# Altium PCB PCB1.PcbDoc
Units mm, origin at the board's own origin, x right, y up, seen from the top; angles counter-clockwise.
Board outline 97 x 82 mm, 4 copper layers (Top Layer, Layer (GND), Layer (PWR), Bottom Layer), stack 0.603 mm thick; 99 components, 112 nets, 370 pads, 75 vias.
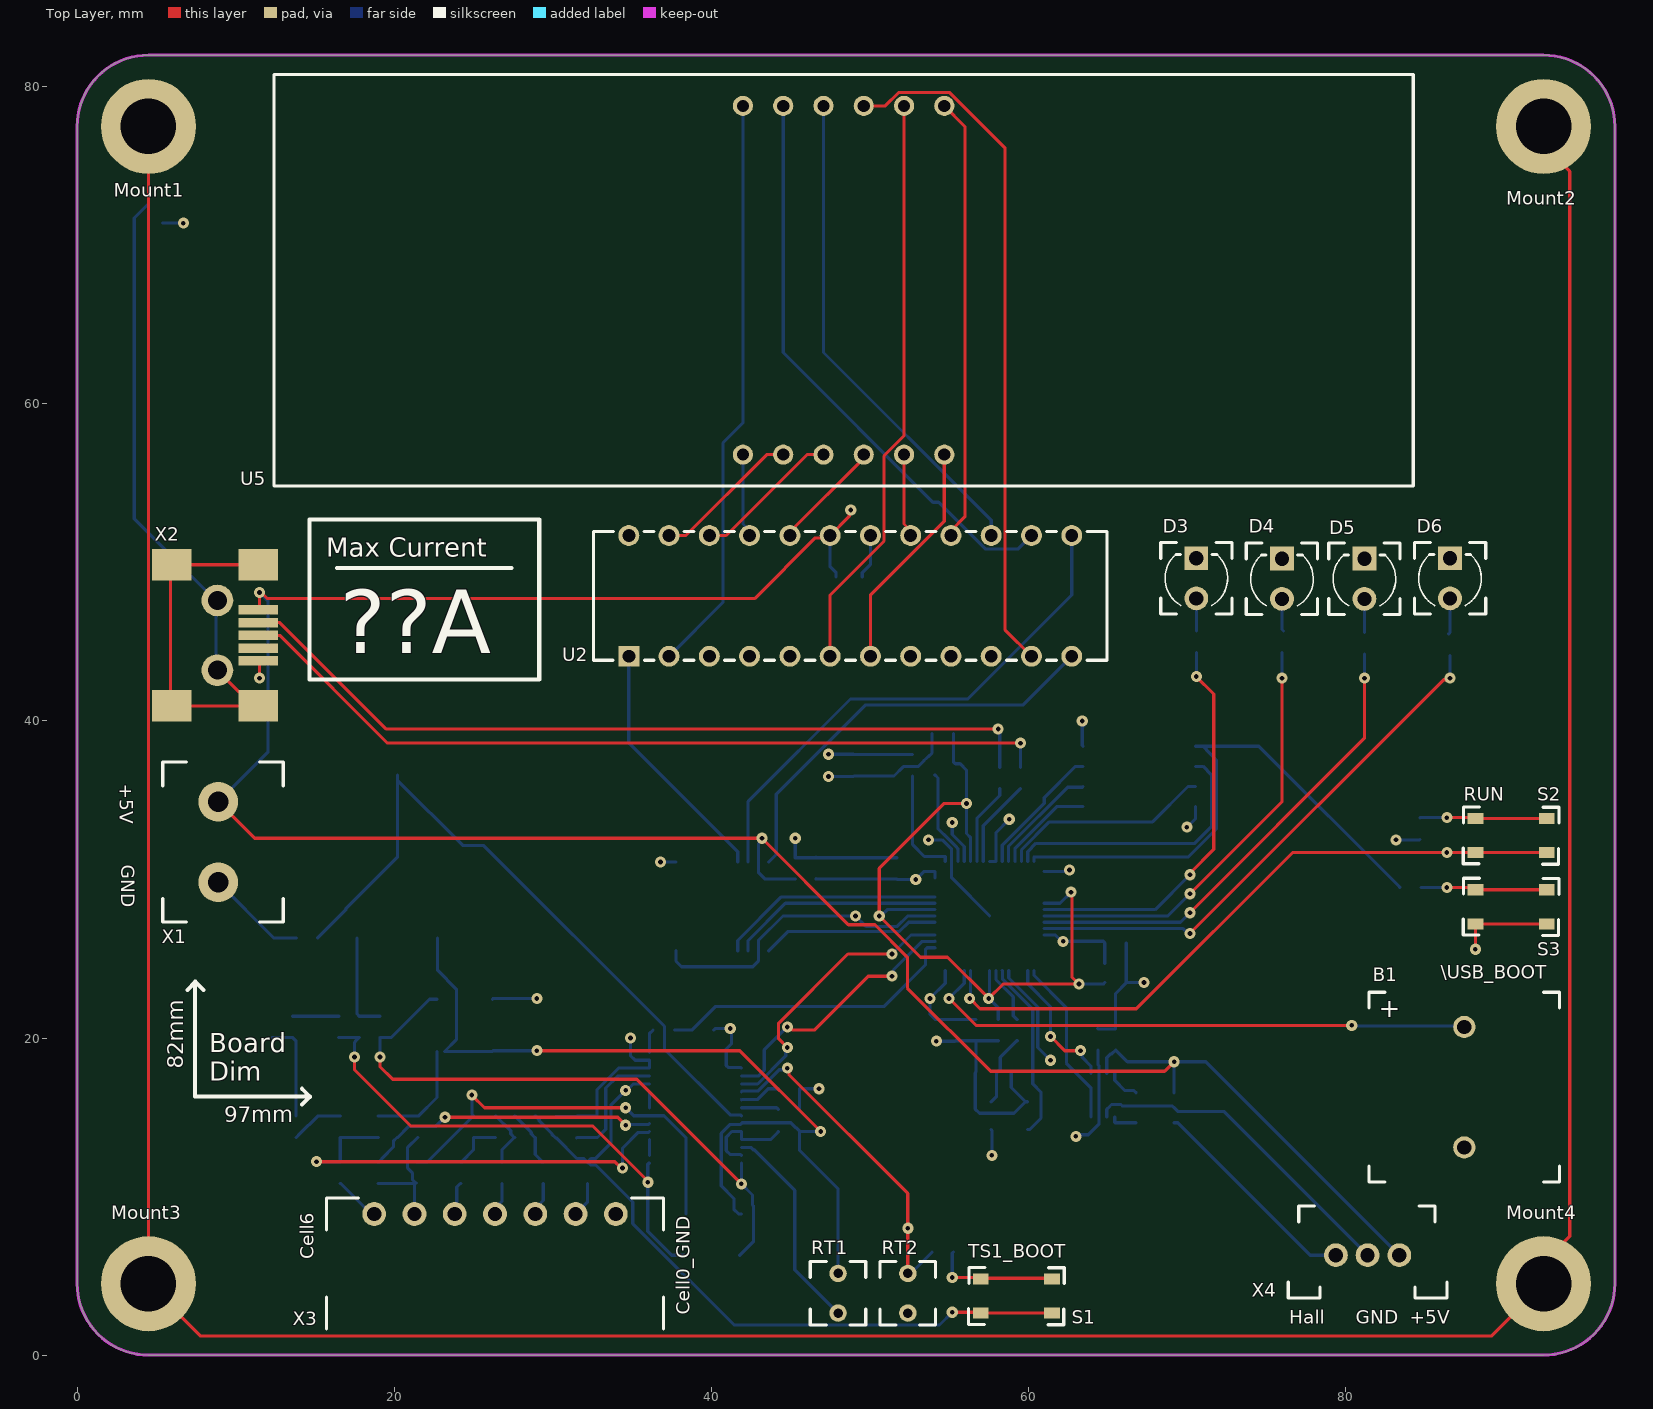
[diagram p0: Top Layer view]
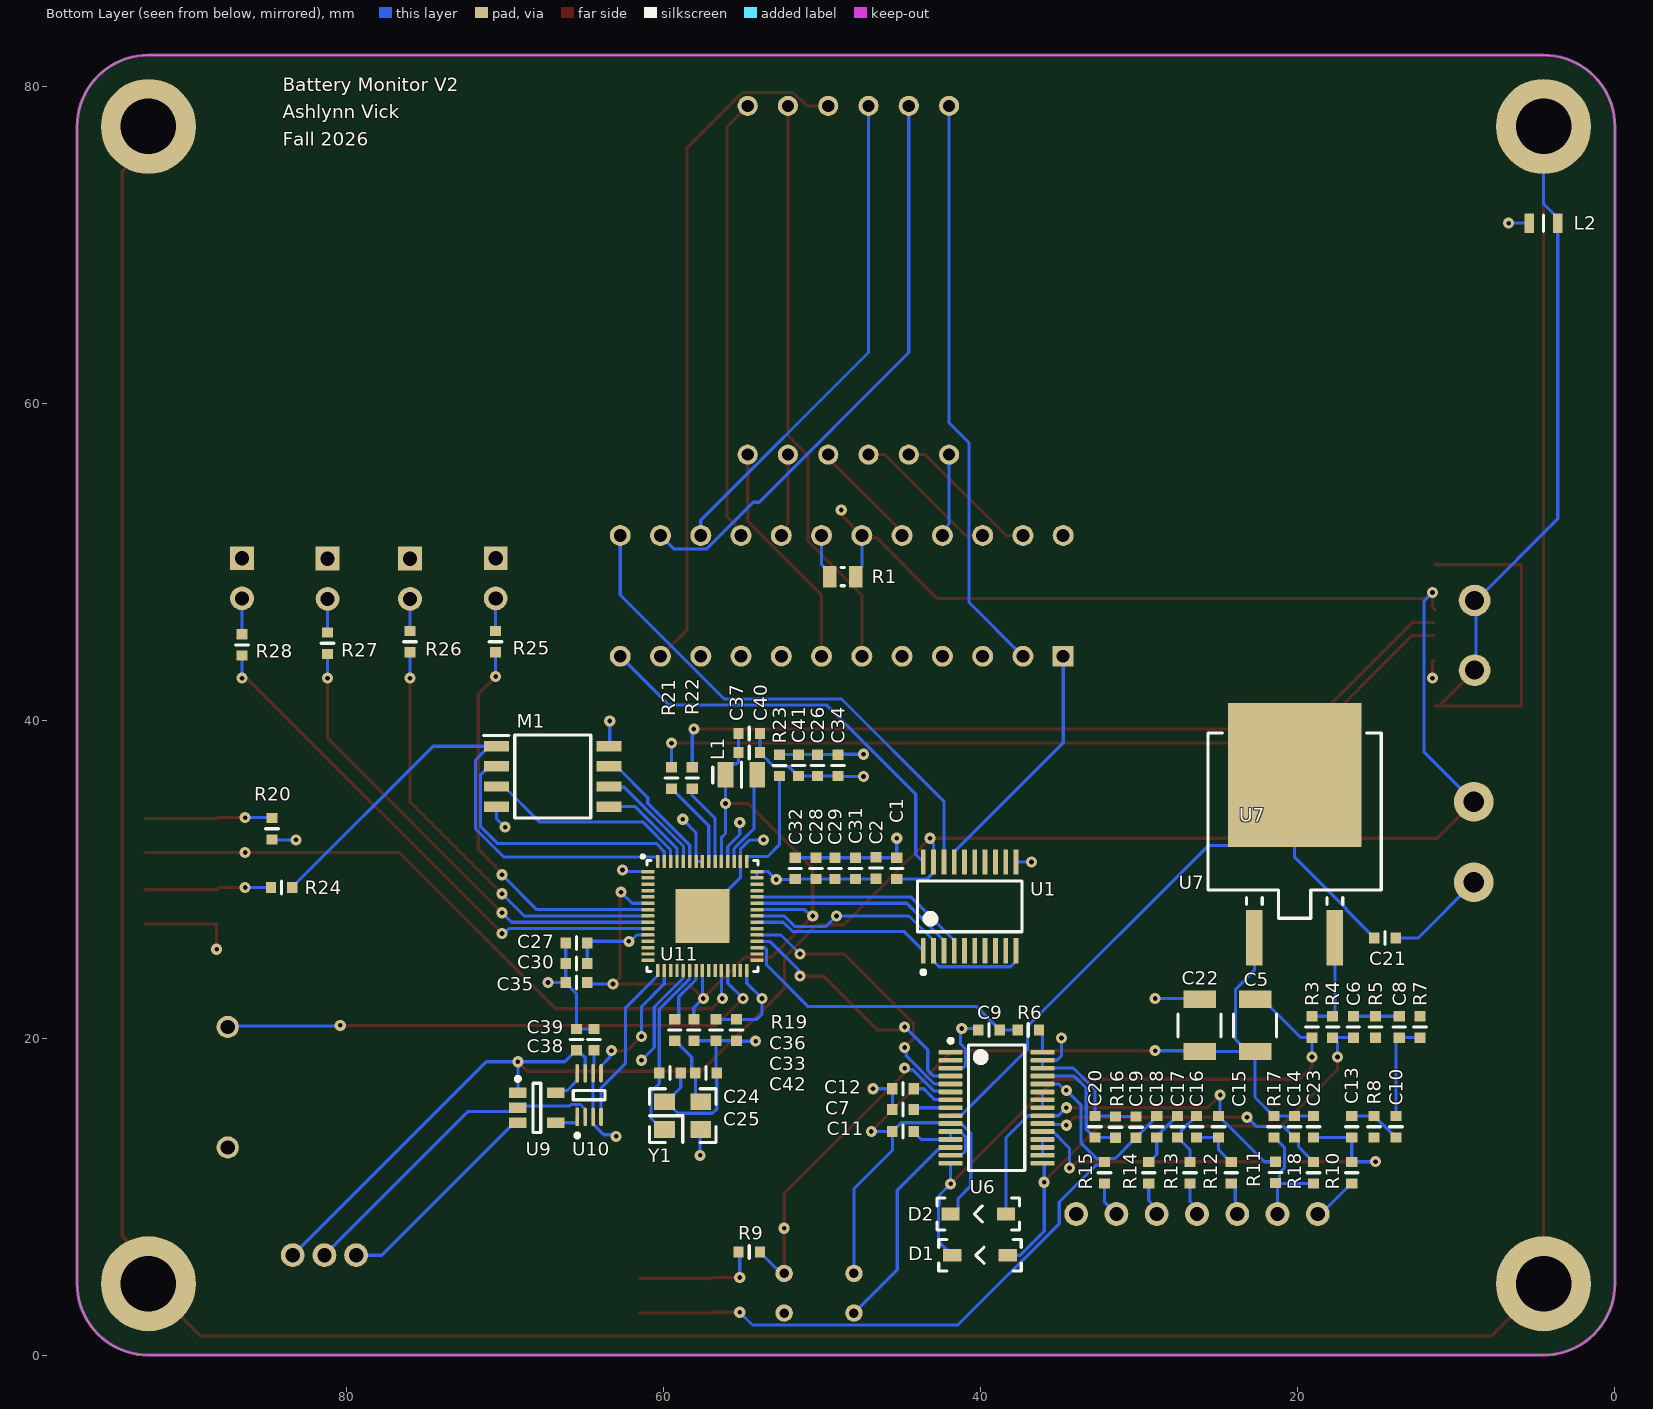
[diagram p1: Bottom Layer view, seen from below]
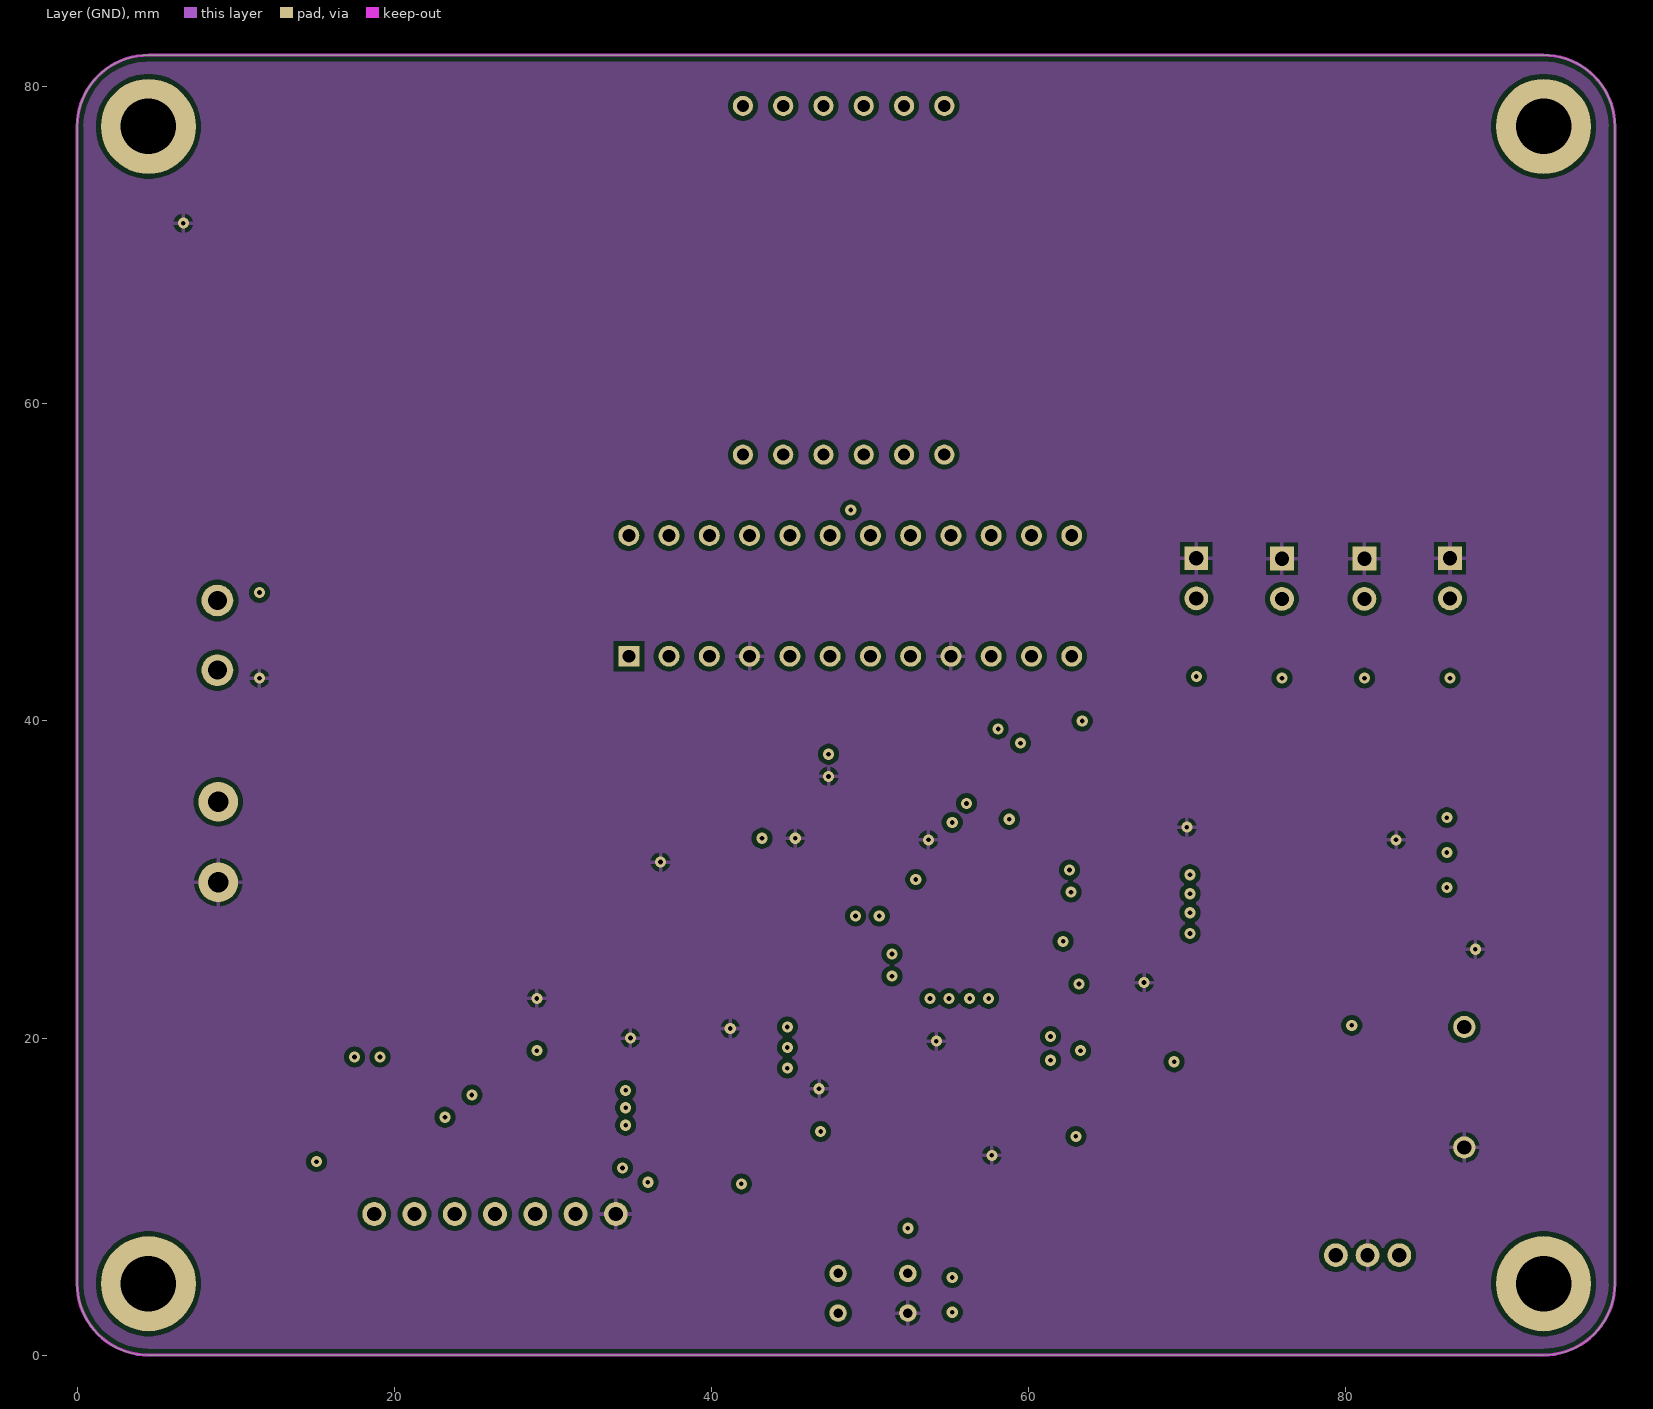
[diagram p2: Layer (GND)]
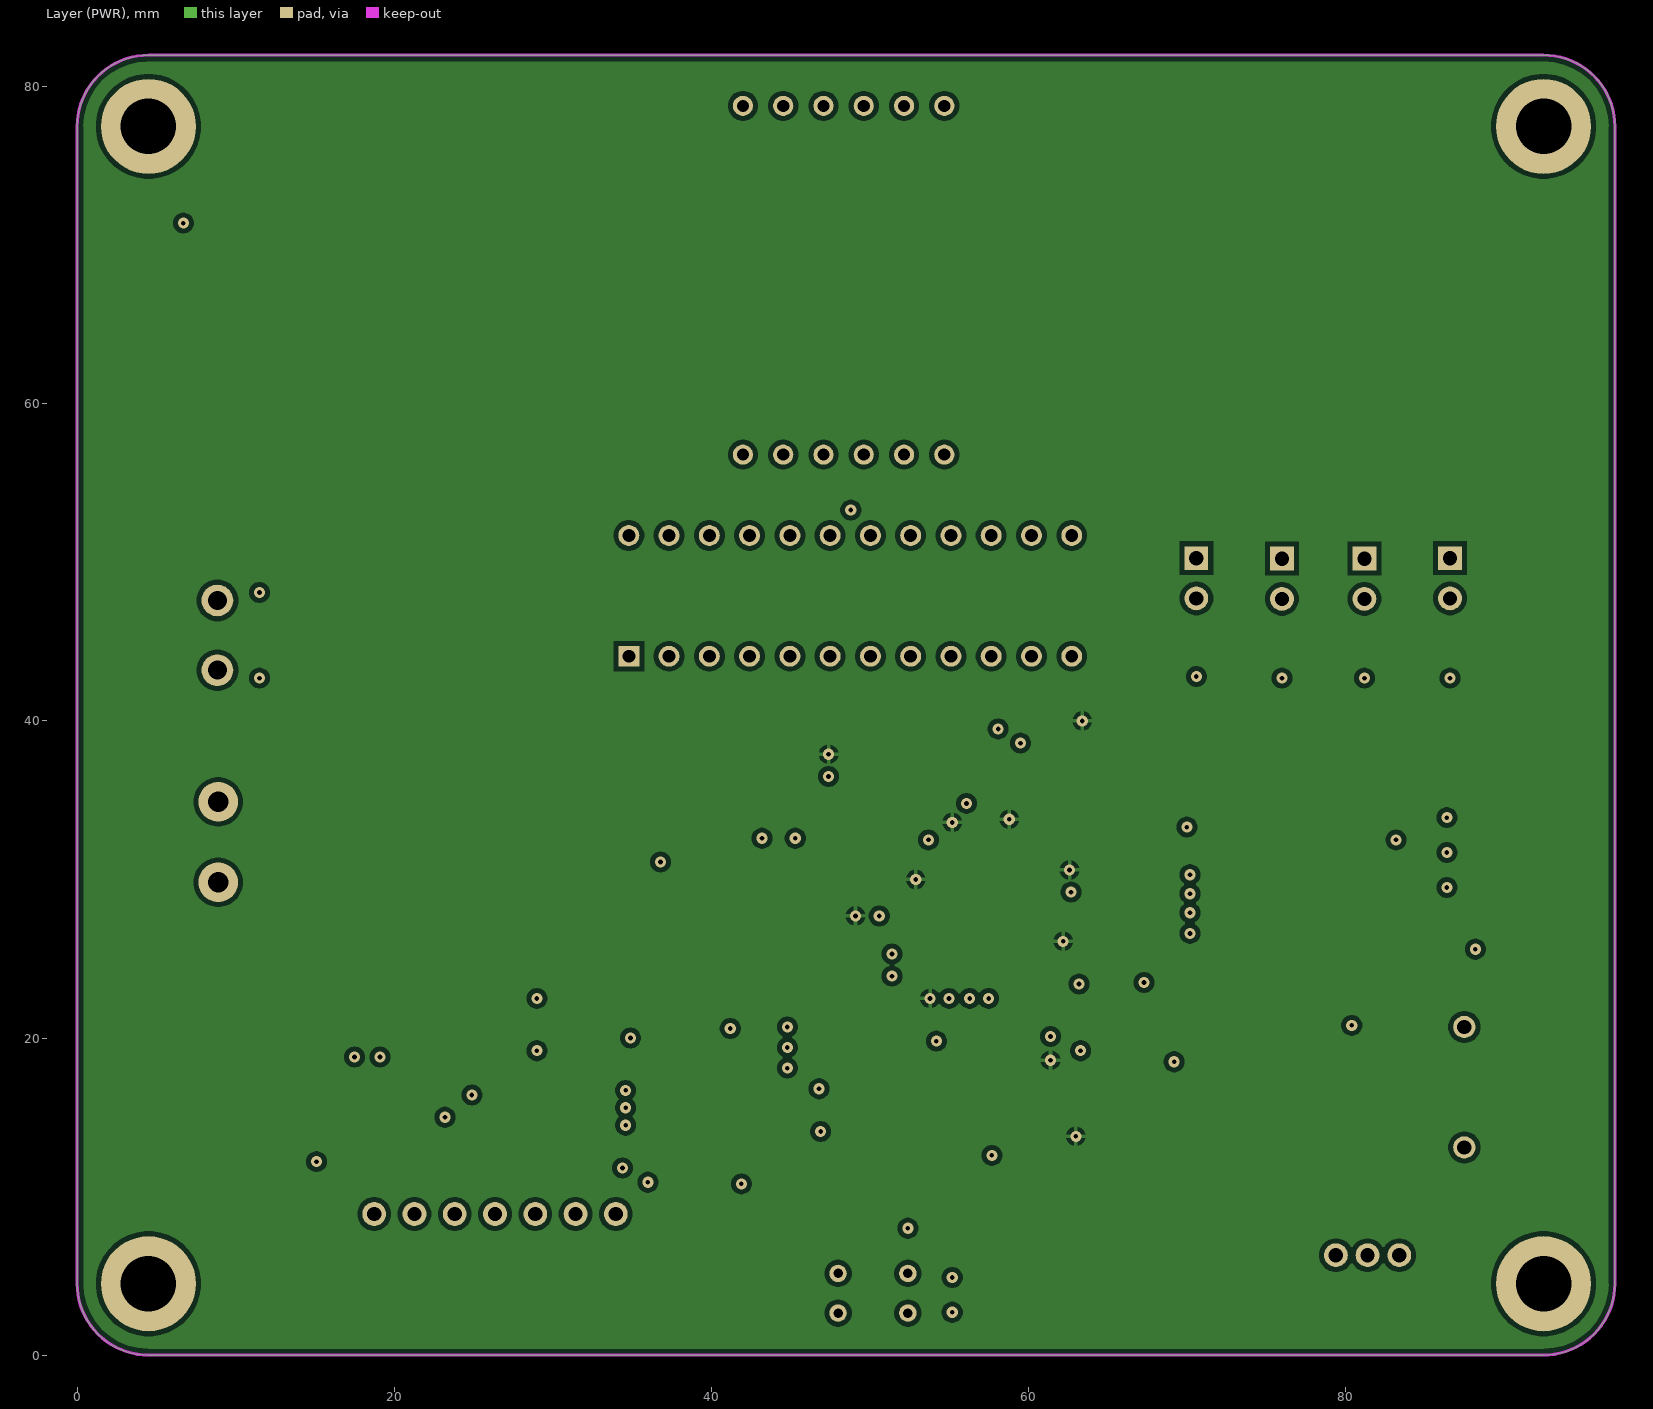
[diagram p3: Layer (PWR)]

## Layer stack, top to bottom
Top Solder: solder mask 0.0102, Solder Resist, Dk 3.5
Top Layer: signal copper 0.0356
Dielectric 2: prepreg 0.0711, PP-006, Dk 4.1
Layer (GND): signal copper 0.035
Dielectric 1: dielectric 0.32, FR-4, Dk 4.8
Layer (PWR): signal copper 0.035
Dielectric 3: prepreg 0.0711, PP-006, Dk 4.1
Bottom Layer: signal copper 0.0356
Bottom Solder: solder mask 0.0102, Solder Resist, Dk 3.5

## Board outline
0,4.5 0,77.5 cw(c4.5,77.5) 4.5,82 92.5,82 cw(c92.5,77.5) 97,77.5 97,4.5 cw(c92.5,4.5) 92.5,0 4.5,0 cw(c4.5,4.5)

## Design rules (kind name [scope] priority, off if disabled: settings)
BoardOutlineClearance [All] p1: gap=0.2 ignorepadtopadclearanceinfootprint=FALSE
Clearance "inPolygon Clearance" [InPolygon] p1: gap=0.3 ignorepadtopadclearanceinfootprint=TRUE // this rule ensures that every net within a polygon of a different net has a set clearance from the poly
Clearance "Different Diff Pair" [All] p2: gap=0.2 ignorepadtopadclearanceinfootprint=TRUE
Clearance "Same Diff Pair" [All] p3: gap=0.1 ignorepadtopadclearanceinfootprint=TRUE
Clearance "Different Nets" [not InAnyDifferentialPair] p4: gap=0.3 ignorepadtopadclearanceinfootprint=TRUE except(0.1: Arc-SMDPad Arc-THPad Arc-Via Arc-Text Track-SMDPad Track-THPad Track-Via Track-Text SMDPad-Text THPad-Text Via-Text Fill-Text Poly-Text Region-Text Text-Text; 0.12: Arc-Arc Arc-Track Track-Track; 0.15: SMDPad-SMDPad SMDPad-THPad SMDPad-Via THPad-THPad THPad-Via Via-Via; 0.2: Arc-Hole Track-Hole SMDPad-Hole THPad-Hole Via-Hole Fill-Hole Poly-Hole Region-Hole Text-Hole)
Clearance "Same Net" [not InAnyDifferentialPair] p5: gap=0 ignorepadtopadclearanceinfootprint=TRUE except(0.1: THPad-Via; 0.18: Arc-Arc Arc-Track Track-Track)
ComponentClearance [All] p1: gap=0.102 collisioncheckmode=3 verticalgap=0.102 showdistances=TRUE
DiffPairsRouting "Ethernet Routing" [InDifferentialPairClass('Ethernet_Pairs')] p1: maxlimit=0.25 minlimit=0.2 mostfreqgap=0.25 toplayer_maxgap=0.2 toplayer_prefgap=0.2 toplayer_minwidth=0.25 toplayer_maxwidth=0.25 toplayer_prefwidth=0.25 midlayer1_mingap=0.25 midlayer1_minwidth=0.19 midlayer1_maxwidth=0.19 midlayer1_prefwidth=0.19 midlayer2_mingap=0.25 midlayer2_minwidth=0.19 midlayer2_maxwidth=0.19 midlayer2_prefwidth=0.19 bottomlayer_maxgap=0.2 bottomlayer_prefgap=0.2 bottomlayer_minwidth=0.25 bottomlayer_maxwidth=0.25 bottomlayer_prefwidth=0.25 impedanceprofiledriven=TRUE maxuncoupledlength=12.7
DiffPairsRouting "USB Routing" [InDifferentialPairClass('USB_Pairs')] p2: maxlimit=0.291 minlimit=0.127 mostfreqgap=0.291 toplayer_maxgap=0.127 toplayer_prefgap=0.127 toplayer_minwidth=0.23 toplayer_maxwidth=0.23 toplayer_prefwidth=0.23 midlayer1_mingap=0.291 midlayer1_minwidth=0.25 midlayer1_maxwidth=0.25 midlayer1_prefwidth=0.25 midlayer2_mingap=0.291 midlayer2_minwidth=0.25 midlayer2_maxwidth=0.25 midlayer2_prefwidth=0.25 bottomlayer_maxgap=0.127 bottomlayer_prefgap=0.127 bottomlayer_minwidth=0.23 bottomlayer_maxwidth=0.23 bottomlayer_prefwidth=0.23 maxuncoupledlength=12.7
DiffPairsRouting "CAN Routing" [InDifferentialPairClass('CAN_Pairs')] p3: maxlimit=0.907 minlimit=0.5 mostfreqgap=0.907 toplayer_maxgap=0.5 toplayer_prefgap=0.5 toplayer_minwidth=0.201 toplayer_maxwidth=0.201 toplayer_prefwidth=0.201 midlayer1_mingap=0.907 midlayer1_minwidth=0.155 midlayer1_maxwidth=0.155 midlayer1_prefwidth=0.155 midlayer2_mingap=0.907 midlayer2_minwidth=0.155 midlayer2_maxwidth=0.155 midlayer2_prefwidth=0.155 bottomlayer_maxgap=0.5 bottomlayer_prefgap=0.5 bottomlayer_minwidth=0.201 bottomlayer_maxwidth=0.201 bottomlayer_prefwidth=0.201 impedanceprofiledriven=TRUE maxuncoupledlength=12.7
Height [All] p1: minheight=0 maxheight=1816.048 prefheight=12.7
HoleSize [All] p1: absolutevalues=TRUE maxlimit=6.3 minlimit=0.3 maxpercent=80.000 minpercent=20.000
HoleToHoleClearance [All] p1: gap=0.25 allowstackedmicrovias=FALSE
MatchedLengths "XTAL Nets Matched Delays" [InNetClass('XTAL_Nets')] p1: tolerance=25.4 checknetsindiffpair=FALSE checkdiffpairvsdiffpair=TRUE checkxsignals=TRUE checkothers=TRUE usedelayunits=TRUE delaytolerance=10.000000
MatchedLengths "Diff Pair Matched Delays" [InDifferentialPairClass('Ethernet_Pairs') or InDifferentialPairClass('USB_Pairs') or InDifferentialPairClass('CAN_Pairs')] p2: tolerance=5 checknetsindiffpair=TRUE checkdiffpairvsdiffpair=FALSE checkxsignals=FALSE checkothers=FALSE usedelayunits=TRUE delaytolerance=100.000000 phasematching=TRUE phasedelaytolerance=5.000000 phasedistance=12.7
MinimumAnnularRing [All] p1: minimumring=0.2
MinimumSolderMaskSliver [All] p1: minsoldermaskwidth=0
PlaneClearance "Supply Net Clearance" [InNetClass('Supply_Nets')] p1: clearance=0.5
PlaneClearance "All Nets" [All] p2: clearance=0.3
PolygonConnect "Supply Nets" [InNetClass('Supply_Nets')] p1: connectstyle=Relief reliefconductorwidth=0.3 reliefentries=4 polygonreliefangle="90 Angle" conductorbypadedge=TRUE mindistance=0.381 enablemindistance=FALSE airgapwidth=0.254
PolygonConnect General [All] p2: connectstyle=Relief reliefconductorwidth=0.254 reliefentries=4 polygonreliefangle="90 Angle" airgapwidth=0.254
RoutingVias [All] p1: holewidth=0.2 width=0.35 viastyle="Through Hole" minholewidth=0.15 minwidth=0.3 maxholewidth=6.3 maxwidth=6.55
SilkToSilkClearance [All] p1: silktosilkclearance=0
SilkToSolderMaskClearance [All] p1: minsilkscreentomaskgap=0 clearancetoexposedcopper=TRUE
SolderMaskExpansion [All] p1: expansion=0.075 istentingtop=FALSE
SupplyNets "Schematic Supply Nets_14" [InNet('D_LOAD (C\S\\) 3V3')] p1: voltage=0.000
SupplyNets "Schematic Supply Nets_13" [InNet('BAT')] p2: voltage=0.000
SupplyNets "Schematic Supply Nets_12" [InNet('MOSI1 3V3')] p3: voltage=0.000
SupplyNets "Schematic Supply Nets_11" [InNet('SCK1 3V3')] p4: voltage=0.000
SupplyNets "Schematic Supply Nets_10" [InNet('SCK1 5V')] p5: voltage=0.000
SupplyNets "Schematic Supply Nets_9" [InNet('MOSI1 5V')] p6: voltage=0.000
SupplyNets "Schematic Supply Nets_8" [InNet('D_LOAD (C\S\\) 5V')] p7: voltage=0.000
SupplyNets "Schematic Supply Nets_7" [InNet('+1V1')] p8: voltage=0.000
SupplyNets "Schematic Supply Nets_6" [InNet('+3V3')] p9: voltage=0.000
SupplyNets "Schematic Supply Nets_5" [InNet('XOUT')] p10: voltage=0.000
SupplyNets "Schematic Supply Nets_4" [InNet('+5V')] p11: voltage=0.000
SupplyNets "Schematic Supply Nets_2" [InNet('XIN')] p12: voltage=0.000
SupplyNets "Schematic Supply Nets" [InNet('RUN')] p13: voltage=0.000
SupplyNets "Schematic Supply Nets_3" [InNet('GND')] p14: voltage=0.000
SupplyNets "Schematic Supply Nets_1" [InNet('Earth')] p15: voltage=0.000
UnRoutedNet [All] p1: checkbadconnections=TRUE
Width "nRF Width" [InNetClass('nRF Signal')] p1: maxlimit=0.379 minlimit=0.263 preferedwidth=0.379 toplayer_minwidth=0.379 midlayer1_maxwidth=0.263 midlayer1_prefwidth=0.263 midlayer2_maxwidth=0.263 midlayer2_prefwidth=0.263 bottomlayer_minwidth=0.379 impedanceprofiledriven=TRUE minimp=50.000000 maximp=50.000000 favimp=50.000000 checkconnectedcopper=TRUE
Width [All] p2: maxlimit=100 minlimit=0.1 preferedwidth=0.2
20 further rules are at their usual default settings.

## Classes and differential pairs
component class Seven-Seg: B1 C1 C2 D3 D4 D5 D6 L2 Mount1 Mount2 Mount3 Mount4 R1 R25 R26 R27 R28 U1 U2 U5
component class RP2350A: C24 C25 C26 C27 C28 C29 C30 C31 C32 C33 C34 C35 C36 C37 C40 C41 C42 L1 M1 R19 R20 R21 R22 R23 R24 S2 S3 U11 X2 Y1
component class Battery-Voltage: C5 C6 C7 C8 C9 C10 C11 C12 C13 C14 C15 C16 C17 C18 C19 C20 C21 C22 C23 D1 D2 R3 R4 R5 R6 R7 R8 R9 R10 R11 R12 R13 R14 R15 R16 R17 R18 RT1 RT2 S1 U6 U7 X1 X3
component class Battery-Current: C38 C39 U9 U10 X4
differential pair RP2350_DX: +RP2350_DX_P -RP2350_DX_N
differential pair RP2350_D: +RP2350_D_P -RP2350_D_N

## Components (designator, comment, footprint, x,y, rotation, side; value= is the part's Value field where it differs from the comment)
B1 "Passive Buzzer" "[Buzzer] Passive Thru-Hole 3V 30mA" 87.5,16.9 r0 top
C1 "[Cap] 0603 0.1uF 10% 50V" "[Cap] SMD 0603" 45.3,30.7 r90 bottom
C2 "[Cap] 0603 0.1uF 10% 50V" "[Cap] SMD 0603" 46.6,30.725 r90 bottom
C5 "10uF ±20% 50VDC" FP-GCM32E-0_3-MFG 22.7,20.8 r90 bottom
C6 "[Cap] 0603 1uF 10% 25V" "[Cap] SMD 0603" 16.5,20.7 r270 bottom
C7 "[Cap] 0603 4.7uF 10% 25V" "[Cap] SMD 0603" 44.9,15.5 r180 bottom
C8 "[Cap] 0603 1uF 10% 25V" "[Cap] SMD 0603" 13.6,20.7 r90 bottom
C9 "[Cap] 0603 470pF 5% 50V" "[Cap] SMD 0603" 39.475,20.5 r180 bottom
C10 "[Cap] 0603 1uF 10% 25V" "[Cap] SMD 0603" 13.8,14.4 r90 bottom
C11 "[Cap] 0603 1uF 10% 25V" "[Cap] SMD 0603" 44.9,14.1 r180 bottom
C12 "[Cap] 0603 1uF 10% 25V" "[Cap] SMD 0603" 44.9,16.8 r180 bottom
C13 "[Cap] 0603 1uF 10% 25V" "[Cap] SMD 0603" 16.6,14.4 r90 bottom
C14 "[Cap] 0603 1uF 10% 25V" "[Cap] SMD 0603" 20.2,14.4 r90 bottom
C15 "[Cap] 0603 1uF 10% 25V" "[Cap] SMD 0603" 25,14.4 r90 bottom
C16 "[Cap] 0603 1uF 10% 25V" "[Cap] SMD 0603" 26.4,14.4 r270 bottom
C17 "[Cap] 0603 1uF 10% 25V" "[Cap] SMD 0603" 27.6,14.4 r270 bottom
C18 "[Cap] 0603 1uF 10% 25V" "[Cap] SMD 0603" 28.9,14.4 r270 bottom
C19 "[Cap] 0603 1uF 10% 25V" "[Cap] SMD 0603" 30.2,14.375 r270 bottom
C20 "[Cap] 0603 1uF 10% 25V" "[Cap] SMD 0603" 32.8,14.4 r90 bottom
C21 "[Cap] 0603 1uF 10% 25V" "[Cap] SMD 0603" 14.5,26.3 r0 bottom
C22 "10uF ±20% 50VDC" FP-GCM32E-0_3-MFG 26.2,20.8 r270 bottom
C23 "[Cap] 0603 1uF 10% 25V" "[Cap] SMD 0603" 19,14.4 r270 bottom
C24 "[Cap] 0603 15pF 1% 100V" "[Cap] SMD 0603" 59.6,17.8 r0 bottom
C25 "[Cap] 0603 15pF 1% 100V" "[Cap] SMD 0603" 57.325,17.8 r0 bottom
C26 "[Cap] 0603 0.1uF 10% 50V" "[Cap] SMD 0603" 50.3,37.2 r90 bottom
C27 "[Cap] 0603 0.1uF 10% 50V" "[Cap] SMD 0603" 65.5,26 r180 bottom
C28 "[Cap] 0603 0.1uF 10% 50V" "[Cap] SMD 0603" 50.4,30.7 r270 bottom
C29 "[Cap] 0603 0.1uF 10% 50V" "[Cap] SMD 0603" 49.2,30.7 r270 bottom
C30 "[Cap] 0603 0.1uF 10% 50V" "[Cap] SMD 0603" 65.5,24.7 r180 bottom
C31 "[Cap] 0603 0.1uF 10% 50V" "[Cap] SMD 0603" 47.9,30.7 r270 bottom
C32 "[Cap] 0603 0.1uF 10% 50V" "[Cap] SMD 0603" 51.7,30.7 r270 bottom
C33 "[Cap] 0603 0.1uF 10% 50V" "[Cap] SMD 0603" 56.7,20.5 r90 bottom
C34 "[Cap] 0603 4.7uF 10% 25V" "[Cap] SMD 0603" 49,37.2 r270 bottom
C35 "[Cap] 0603 0.1uF 10% 50V" "[Cap] SMD 0603" 65.5,23.5 r180 bottom
C36 "[Cap] 0603 0.1uF 10% 50V" "[Cap] SMD 0603" 58.1,20.5 r90 bottom
C37 "[Cap] 0603 4.7uF 10% 25V" "[Cap] SMD 0603" 54.6,39.2 r0 bottom
C38 "[Cap] 0603 0.1uF 10% 50V" "[Cap] SMD 0603" 64.4,19.9 r270 bottom
C39 "[Cap] 0603 0.1uF 10% 50V" "[Cap] SMD 0603" 65.5,19.9 r90 bottom
C40 "[Cap] 0603 4.7uF 10% 25V" "[Cap] SMD 0603" 54.6,38 r180 bottom
C41 "[Cap] 0603 4.7uF 10% 25V" "[Cap] SMD 0603" 51.5,37.2 r90 bottom
C42 "[Cap] 0603 0.1uF 10% 50V" "[Cap] SMD 0603" 55.4,20.5 r90 bottom
D1 "SOD123" "[Diode] SMD SOD-123" 40.05,6.3 r0 bottom
D2 "SOD123" "[Diode] SMD SOD-123" 40.15,8.9 r0 bottom
D3 "[LED] Thru-Hole 3mm Red" "[LED] Thru-Hole 3mm Red" 70.6,49 r90 top
D4 "[LED] Thru-Hole 3mm Yellow" "[LED] Thru-Hole 3mm Yellow" 76,48.97 r90 top
D5 "[LED] Thru-Hole 3mm Green" "[LED] Thru-Hole 3mm Green" 81.2,48.97 r90 top
D6 "[LED] Thru-Hole 3mm White" "[LED] Thru-Hole 3mm White" 86.6,49 r90 top
L1 "[3.3uH] SMD 0806 2.1A" "[Inductor] SMD 0806" 55.1,36.6 r180 bottom
L2 "652-MH2029-300Y" "[Ferrite] SMD 0805" 4.5,71.4 r180 bottom
M1 "W25Q128JVSIM" "[Flash] 128MBit" 67,36.5 r180 bottom
Mount1 "M3 Mount Hole" "[Mount] M3 Mount Hole" 4.5,77.5 r0 top
Mount2 "M3 Mount Hole" "[Mount] M3 Mount Hole" 92.5,77.5 r0 top
Mount3 "M3 Mount Hole" "[Mount] M3 Mount Hole" 4.5,4.5 r0 top
Mount4 "M3 Mount Hole" "[Mount] M3 Mount Hole" 92.5,4.5 r0 top
R1 "9.53 kOhms ±1% 0.25W, 1/4W" RESC2013X60X30LL20T20 48.7,49.1 r0 bottom
R3 "[100] SMD 0603 1% 1/10W" "[Res] SMD 0603" 19.1,20.7 r90 bottom
R4 "[1k] SMD 0603 1% 1/10W" "[Res] SMD 0603" 17.8,20.7 r270 bottom
R5 "[1k] SMD 0603 1% 1/10W" "[Res] SMD 0603" 15.1,20.7 r90 bottom
R6 "[499k] SMD 0603 1% 1/8W" "[Res] SMD 0603" 37,20.5 r0 bottom
R7 "[1k] SMD 0603 1% 1/10W" "[Res] SMD 0603" 12.3,20.7 r270 bottom
R8 "[1k] SMD 0603 1% 1/10W" "[Res] SMD 0603" 15.2,14.4 r90 bottom
R9 "[10k] SMD 0603 1% 1/8W" "[Res] SMD 0603" 54.6,6.5 r0 bottom
R10 "[1k] SMD 0603 1% 1/10W" "[Res] SMD 0603" 16.6,11.5 r90 bottom
R11 "[1k] SMD 0603 1% 1/10W" "[Res] SMD 0603" 21.4,11.525 r90 bottom
R12 "[1k] SMD 0603 1% 1/10W" "[Res] SMD 0603" 24.2,11.5 r90 bottom
R13 "[1k] SMD 0603 1% 1/10W" "[Res] SMD 0603" 26.8,11.5 r90 bottom
R14 "[1k] SMD 0603 1% 1/10W" "[Res] SMD 0603" 29.4,11.5 r90 bottom
R15 "[1k] SMD 0603 1% 1/10W" "[Res] SMD 0603" 32.2,11.5 r90 bottom
R16 "[1k] SMD 0603 1% 1/10W" "[Res] SMD 0603" 31.5,14.375 r270 bottom
R17 "[100] SMD 0603 1% 1/10W" "[Res] SMD 0603" 21.5,14.4 r90 bottom
R18 "[1k] SMD 0603 1% 1/10W" "[Res] SMD 0603" 19,11.5 r90 bottom
R19 "[1k] SMD 0603 1% 1/10W" "[Res] SMD 0603" 59.3,20.5 r90 bottom
R20 "[1k] SMD 0603 1% 1/10W" "[Res] SMD 0603" 84.7,33.2 r90 bottom
R21 "[27] SMD 0603 1% 1/10W" "[Res] SMD 0603" 59.5,36.4 r270 bottom
R22 "[27] SMD 0603 1% 1/10W" "[Res] SMD 0603" 58.2,36.4 r270 bottom
R23 "[33] SMD 0603 0.5% 1/16W" "[Res] SMD 0603" 52.7,37.2 r270 bottom
R24 "[1k] SMD 0603 1% 1/10W" "[Res] SMD 0603" 84.1,29.5 r0 bottom
R25 "[220] SMD 0603 5% 1/10W" "[Res] SMD 0603" 70.6,45 r90 bottom
R26 "[220] SMD 0603 5% 1/10W" "[Res] SMD 0603" 76,45 r90 bottom
R27 "[220] SMD 0603 5% 1/10W" "[Res] SMD 0603" 81.2,44.9 r90 bottom
R28 "[220] SMD 0603 5% 1/10W" "[Res] SMD 0603" 86.6,44.8 r90 bottom
RT1 "[NTC] 10k Thru-Hole" "[NTC] 10k Thru-Hole" 48,3.9 r90 top
RT2 "[NTC] 10k Thru-Hole" "[NTC] 10k Thru-Hole" 52.4,3.9 r90 top
S1 "[SPST] SMD Pushbutton" "[SPST] SMD Pushbutton" 59.25,3.725 r0 top
S2 "[SPST] SMD Pushbutton" "[SPST] SMD Pushbutton" 90.45,32.775 r0 top
S3 "[SPST] SMD Pushbutton" "[SPST] SMD Pushbutton" 90.45,28.275 r0 top
U1 "TXS0108EQPWRQ1" FP-PW0020A-MFG 40.7,28.3 r90 bottom
U2 "MAX7219CNG" 21-0043D_24_MXM 34.8,44.08 r90 top
U5 "COM-11405" COM-11405_SPK 42,56.8 r90 top
U6 "BQ7693003DBTR" FP-DBT0030A-MFG 39,15.6 r180 bottom
U7 "AOB290L" TO-263-3_AOS 20.2,34.289 r180 bottom
U9 "MCP3221A0T-E/OT" SOT-23-OT5_N 68,15.6 r180 bottom
U10 "TCA9406DCUR" FP-DCU0008A-IPC_B 64.7,16.4 r90 bottom
U11 "RP2350A" "[MCU] RP2350A" 57.56,27.7 r180 bottom
X1 "2pin Screw Terminal" "[Screw Terminal] 2pin 5mm" 8.9,32.4 r270 top
X2 "[USB] Type-B Mini" "[USB] Type-B Mini" 7.6,45.4 r270 top
X3 "[JST] 7pin 90deg 2.54mm pitch" "[JST] 7pin 90deg 2.54mm pitch" 26.36,8.9 r270 top
X4 "[Sherlock] 3pin" "[Sherlock] 3pin" 81.4,6.3 r180 top
Y1 "XTAL 12MHz" "[Crystal] SMD 12MHz" 58.8,15.1 r180 bottom

## Footprints (in the part's own frame and the unit in brackets; to place one, negate y for a bottom-side part, rotate by r counter-clockwise, add the part's x,y. Pads: shape width x height; smd on the part's side, far side on the other; paste and mask are expansions set on the pad)
21-0043D_24_MXM [mil]
  rect 52x52 hole 32 paste-99999 mask+0: 1(0,0)
  round 52 hole 32 paste-99999 mask+0: 2(0,-100) 3(0,-200) 4(0,-300) 5(0,-400) 6(0,-500) 7(0,-600) 8(0,-700) 9(0,-800) 10(0,-900) 11(0,-1000) 12(0,-1100) 13(300,-1100) 14(300,-1000) 15(300,-900) 16(300,-800) 17(300,-700) 18(300,-600) 19(300,-500) 20(300,-400) 21(300,-300) 22(300,-200) 23(300,-100) 24(300,0)
  silkscreen extent -10,-1188 310,88, body extent -5,-1183 310,83, height 185
"[Buzzer] Passive Thru-Hole 3V 30mA" [mm] "AI-1223-TWT-3V-2-R"
  round 1.4 hole 0.9: 1(0,3.8) 2(0,-3.8)
  silkscreen extent -6,-5.99 6,5.99, body extent -6,-5.99 6,5.99, height 7.8
"[Cap] SMD 0603" [mm]
  rect 0.65x0.7 smd: 1(-0.675,0) 2(0.675,0)
  silkscreen extent 0,-0.4 0,0.4, body extent -0.8,-0.45 0.8,0.45, height 0.8
"[Crystal] SMD 12MHz" [mm]
  rect 1.3x1.05 smd: 1(-1.15,-0.875) 2(1.15,-0.875) 3(1.15,0.875) 4(-1.15,0.875)
  silkscreen extent -2.1,-1.7 2.1,1.7, body extent -1.6,-1.25 1.6,1.25, height 0.75
"[Diode] SMD SOD-123" [mm]
  rect 1.15x0.8 smd: 1(1.75,0) 2(-1.75,0)
  silkscreen extent -2.6,-1 2.6,1, body extent -1.85,-0.8 1.86,0.8, height 1.35
"[Ferrite] SMD 0805" [mm]
  rect 0.6x1.25 smd: 1(-0.9,0) 2(0.9,0)
  silkscreen extent 0,-0.53 0,0.53, body extent -1,-0.6 1,0.6, height 1.1
"[Flash] 128MBit" [mm] "W25Q128JVSIM"
  rect 1.6x0.65 smd: 1(-3.55,1.905) 2(-3.55,0.635) 3(-3.55,-0.635) 4(-3.55,-1.905) 5(3.55,-1.905) 6(3.55,-0.635) 7(3.55,0.635) 8(3.55,1.905)
  silkscreen extent -4.35,-2.61 2.4,2.62, body extent -3.9,-2.61 3.9,2.62, height 1.95
"[Inductor] SMD 0806" [mm]
  rect 1x1.6 smd: 1(-1,0) 2(1,0)
  silkscreen extent -1.8,-0.8 0,0.8, body extent -1,-0.8 1,0.8, height 1
"[JST] 7pin 90deg 2.54mm pitch" [mm]
  round 1.5 hole 0.9: 1(0,-7.62) 2(0,-5.08) 3(0,-2.54) 4(0,0) 5(0,2.54) 6(0,5.08) 7(0,7.62)
  silkscreen extent -1,-10.62 7.25,10.62, body extent -0.46,-10.25 7,10.25, height 2.88
"[LED] Thru-Hole 3mm Green" [mm]
  round 1.5 hole 0.9: 1(-1.27,0)
  rect 1.5x1.5 hole 0.9: 2(1.27,0)
  silkscreen extent -2.25,-2.25 2.25,2.25, body extent -1.9,-1.92 1.68,1.92, height 5.6
"[LED] Thru-Hole 3mm Red" [mm]
  round 1.5 hole 0.9: 1(-1.27,0)
  rect 1.5x1.5 hole 0.9: 2(1.27,0)
  silkscreen extent -2.25,-2.25 2.25,2.25, body extent -1.88,-1.92 1.68,1.92, height 5.6
"[LED] Thru-Hole 3mm White" [mm]
  round 1.5 hole 0.9: 1(-1.27,0)
  rect 1.5x1.5 hole 0.9: 2(1.27,0)
  silkscreen extent -2.25,-2.25 2.25,2.25, body extent -1.88,-1.92 1.68,1.92, height 5.6
"[LED] Thru-Hole 3mm Yellow" [mm]
  round 1.5 hole 0.9: 1(-1.27,0)
  rect 1.5x1.5 hole 0.9: 2(1.27,0)
  silkscreen extent -2.25,-2.25 2.25,2.25, body extent -1.88,-1.92 1.68,1.92, height 5.6
"[MCU] RP2350A" [mm]
  rrect25% 0.83x0.22 smd: 1(-3.44,2.8) 2(-3.44,2.4) 3(-3.44,2) 4(-3.44,1.6) 5(-3.44,1.2) 6(-3.44,0.8) 7(-3.44,0.4) 8(-3.44,0) 9(-3.44,-0.4) 10(-3.44,-0.8) 11(-3.44,-1.2) 12(-3.44,-1.6) 13(-3.44,-2) 14(-3.44,-2.4) 15(-3.44,-2.8) 31(3.44,-2.8) 32(3.44,-2.4) 33(3.44,-2) 34(3.44,-1.6) 35(3.44,-1.2) 36(3.44,-0.8) 37(3.44,-0.4) 38(3.44,0) 39(3.44,0.4) 40(3.44,0.8) 41(3.44,1.2) 42(3.44,1.6) 43(3.44,2) 44(3.44,2.4) 45(3.44,2.8)
  rrect25% 0.22x0.83 smd: 16(-2.8,-3.44) 17(-2.4,-3.44) 18(-2,-3.44) 19(-1.6,-3.44) 20(-1.2,-3.44) 21(-0.8,-3.44) 22(-0.4,-3.44) 23(0,-3.44) 24(0.4,-3.44) 25(0.8,-3.44) 26(1.2,-3.44) 27(1.6,-3.44) 28(2,-3.44) 29(2.4,-3.44) 30(2.8,-3.44) 46(2.8,3.44) 47(2.4,3.44) 48(2,3.44) 49(1.6,3.44) 50(1.2,3.44) 51(0.8,3.44) 52(0.4,3.44) 53(0,3.44) 54(-0.4,3.44) 55(-0.8,3.44) 56(-1.2,3.44) 57(-1.6,3.44) 58(-2,3.44) 59(-2.4,3.44) 60(-2.8,3.44)
  rect 3.4x3.4 smd paste-4: 61(0,0)
  silkscreen extent -3.85,-3.5 3.5,3.85, body extent -3.55,-3.55 3.55,3.55, height 0.96
"[Mount] M3 Mount Hole" [mm]
  round 6 hole 3.5: 1(0,0)
"[NTC] 10k Thru-Hole" [mm] "B57164K0103J000"
  round 1.1 hole 0.6: 1(-1.25,0) 2(1.25,0)
  silkscreen extent -2,-1.75 2,1.75, body extent -1.45,-1.25 1.45,1.25, height 7.81
"[Res] SMD 0603" [mm]
  rect 0.65x0.7 smd: 1(-0.675,0) 2(0.675,0)
  silkscreen extent 0,-0.4 0,0.4, body extent -0.8,-0.45 0.8,0.45, height 0.8
"[Screw Terminal] 2pin 5mm" [mm]
  round 2.5 hole 1.3: 1(-2.5,0) 2(2.58,0)
  silkscreen extent -5.01,-3.5 5.09,4.1, body extent -5.45,-3.5 5.05,4.1, height 9.99
"[Sherlock] 3pin" [mm]
  round 1.5 hole 0.9: 1(-2,0) 2(0,0) 3(2,0)
  silkscreen extent -5,-3.1 5,2.7, body extent -4.81,-2.97 4.89,2.58, height 8.5
"[SPST] SMD Pushbutton" [mm] "PTS815SJM250SMTRLFS"
  rect 1x0.7 smd: 1(-2.25,1.075) 1(2.25,1.075) 2(-2.25,-1.075) 2(2.25,-1.075)
  silkscreen extent -3.02,-1.82 3.02,1.8, body extent -2.25,-1.6 2.25,1.6, height 2.5
"[USB] Type-B Mini" [mm] "MUSB-05-S-B-SM-A-K-TR"
  rect 0.6x2.5 smd: 1(-1.6,3.83) 2(-0.8,3.83) 3(0,3.83) 4(0.8,3.83) 5(1.6,3.83)
  rect 2x2.5 smd: MH(-4.45,3.83) MH(-4.45,-1.62) MH(4.45,3.83) MH(4.45,-1.62)
  round 2 hole 1.2: MH(-2.2,1.25) MH(2.2,1.25)
  body extent -5,-4.57 5,4.93, height 4.12
COM-11405_SPK [mil]
  round 50 hole 30 paste-99999 mask+0: 1(0,0) 2(0,-100) 3(0,-200) 4(0,-300) 5(0,-400) 6(0,-500) 7(866.14,-500) 8(866.14,-400) 9(866.14,-300) 10(866.14,-200) 11(866.14,-100) 12(866.14,0)
  silkscreen extent -78,-1664 944,1164, body extent -5,-1659 876,1159, height 340
FP-DBT0030A-MFG [mm]
  rrect33% 1.5x0.3 smd paste+0 mask+0: 1(-2.9,3.5) 2(-2.9,3) 3(-2.9,2.5) 4(-2.9,2) 5(-2.9,1.5) 6(-2.9,1) 7(-2.9,0.5) 8(-2.9,0) 9(-2.9,-0.5) 10(-2.9,-1) 11(-2.9,-1.5) 12(-2.9,-2) 13(-2.9,-2.5) 14(-2.9,-3) 15(-2.9,-3.5) 16(2.9,-3.5) 17(2.9,-3) 18(2.9,-2.5) 19(2.9,-2) 20(2.9,-1.5) 21(2.9,-1) 22(2.9,-0.5) 23(2.9,0) 24(2.9,0.5) 25(2.9,1) 26(2.9,1.5) 27(2.9,2) 28(2.9,2.5) 29(2.9,3) 30(2.9,3.5)
  silkscreen extent -3.03,-3.95 1.78,4.35, body extent -3.21,-3.9 3.21,3.9, height 1.2
FP-DCU0008A-IPC_B [mm]
  rect 1.16x0.237 smd paste+0 mask+0: 1(-1.376,0.75)
  rrect100% 1.16x0.237 smd paste+0 mask+0: 2(-1.376,0.25) 3(-1.376,-0.25) 4(-1.376,-0.75) 5(1.376,-0.75) 6(1.376,-0.25) 7(1.376,0.25) 8(1.376,0.75)
  silkscreen extent -2.67,-1 0.3,1, body extent -1.55,-1 1.55,1, height 0.9
FP-GCM32E-0_3-MFG [mm]
  rect 1.1x2.05 smd paste+0 mask+0: 1(-1.65,0) 2(1.65,0)
  silkscreen extent -0.72,-1.35 0.72,1.35, body extent -1.6,-1.25 1.6,1.25, height 2.7
FP-PW0020A-MFG [mm]
  rect 1.6x0.3 smd paste-1000 mask+0: 1(-2.8,2.925) 2(-2.8,2.275) 3(-2.8,1.625) 4(-2.8,0.975) 5(-2.8,0.325) 6(-2.8,-0.325) 7(-2.8,-0.975) 8(-2.8,-1.625) 9(-2.8,-2.275) 10(-2.8,-2.925) 11(2.8,-2.925) 12(2.8,-2.275) 13(2.8,-1.625) 14(2.8,-0.975) 15(2.8,-0.325) 16(2.8,0.325) 17(2.8,0.975) 18(2.8,1.625) 19(2.8,2.275) 20(2.8,2.925)
  silkscreen extent -4.27,-3.3 1.6,3.3, body extent -3.22,-3.25 3.18,3.25, height 1.2
RESC2013X60X30LL20T20 [mm] "Chip Resistor, 2-Leads, Body 2.00x1.25mm, IPC High Density"
  rect 0.85x1.35 smd: 1(-0.825,0) 2(0.825,0)
  silkscreen extent -0.1,-0.58 0.1,0.58, body extent -1.1,-0.72 1.1,0.72, height 0.6
SOT-23-OT5_N [mm] "SOT23, 5-Leads, Body 2.9x1.7mm, Pitch 0.95mm, Lead Span 2.8mm, IPC Medium Density"
  rect 1.1x0.65 smd: 1(-1.2,0.95) 2(-1.2,0) 3(-1.2,-0.95) 4(1.2,-0.95) 5(1.2,0.95)
  silkscreen extent -1.33,-1.55 0.25,1.95, body extent -0.9,-1.55 0.9,1.55, height 1.45
TO-263-3_AOS [mil]
  rect 40.97x137.56 smd paste+0 mask+0: 1(-100,-314) 2(100,-314)
  rect 332x358 smd paste+0 mask+0: 3(0,91)
  silkscreen extent -215,-265 215,195, body extent -210,-369 210,256, height 190

## Part data
B1: library part "[Buzzer] Passive Thru-Hole 3V 30mA", "AI-1223-TWT-3V-2-R", Supplier Part Number 1=668-1456-ND, Supplier 1=DigiKey
C1 C2 C38 C39: "GCM155R71H104KE02J", Capacitance=100nF, Max Voltage=50V, Size Package=0603, Supplier Part Number 1=490-14514-6-ND, Tolerance=10%, Supplier 1=DigiKey
C5 C22: library part CMP-06035-056560-1, "GCM32EC71H106MA03K Ceramic Capacitor for Automotive 10uF ±20% 50VDC X7S 1210 Embossed T/R"
C6 C8 C10 C11 C12 C13 C14 C15 C16 C17 C18 C19 C20 C21 C23: "CL10B105KA8NNNC", Capacitance=1uF, Max Voltage=25V, Size Package=0603, Supplier Part Number 1=1276-1184-1-ND, Tolerance=10%, Supplier 1=DigiKey
C7 C34 C37 C40 C41: "GRM188R61E475KE11D", Capacitance=4.7uF, Max Voltage=25V, Size Package=0603, Supplier Part Number 1=490-7203-6-ND, Tolerance=10%, Supplier 1=DigiKey
C9: "CL10C471JB8NNNC", Capacitance=470pF, Max Voltage=50V, Size Package=0603, Supplier Part Number 1=1276-1168-1-ND, Tolerance=5%, Supplier 1=DigiKey
C24 C25: "GCM1885C2A150FA16D", Capacitance=15pF, Max Voltage=100V, Size Package=0603, Supplier Part Number 1=490-16416-1-ND, Tolerance=1%, Supplier 1=DigiKey
C26 C27 C28 C29 C30 C31 C32 C33 C35 C36 C42: "CL10B104KB8NNNC", Capacitance=100nF, Max Voltage=50V, Size Package=0603, Supplier Part Number 1=1276-1000-6-ND, Tolerance=10%, Supplier 1=DigiKey
D1 D2: library part "[Schottky] SMD 40V 1A", "B5819W-TP", Supplier Part Number 1=B5819W-TPMSCT-ND, Supplier 1=DigiKey
D3: "151031SS06000", Color=Red, Supplier Part Number 1=732-5006-ND, Lens Diameter=3mm, Supplier 1=DigiKey
D4: "151031YS05900", Color=Yellow, Supplier Part Number 1=732-5009-ND, Lens Diameter=3mm, Supplier 1=DigiKey
D5: "151031VS06000", Color=Green, Supplier Part Number 1=732-5008-ND, Lens Diameter=3mm, Supplier 1=DigiKey
D6: "151031VS06000", Color=White, Supplier Part Number 1=1516-QBL7IW60D-WW-ND, Lens Diameter=3mm, Supplier 1=DigiKey
L1: "AOTA-B201610S3R3-101-T", Inductance=3.3uH, Package=0806, Supplier Part Number 1=535-AOTA-B201610S3R3-101-TCT-ND, Supplier 1=DigiKey
L2: library part "[Ferrite] SMD 0805 3A 30ohm", Res @ Freq="30 @ 100MHz", Size Package=0805, Supplier Part Number 1=MH2029-300YCT-ND, Supplier 1=DigiKey
M1: library part "[Flash] 128MBit", Supplier Part Number 1=W25Q128JVSIM-ND, Supplier 1=DigiKey
Mount1 Mount2 Mount3 Mount4: library part "[Mount] M3 Mount Hole", "Place at least 4.5mm from board edge. Plated."
R1: library part CMP-2001-01986-1, "RK73H2ATTD9531F", Manufacturer="KOA Speer", Part Number=RK73H2ATTD9531F
R3 R17: "RC0603FR-07100RL", Resistance=100, Size Package=0603, Supplier Part Number 1=311-100HRDKR-ND, Tolerance=1%, Supplier 1=DigiKey, Wattage=1/10W
R4 R5 R7 R8 R10 R11 R12 R13 R14 R15 R16 R18 R19 R20 R24: "RMCF0603FT1K00", Resistance=1k, Size Package=0603, Supplier Part Number 1=RMCF0603FT1K00DKR-ND, Tolerance=1%, Supplier 1=DigiKey, Wattage=1/10W
R6: "CRCW0603499KFKEA", Resistance=499k, Size Package=0603, Supplier Part Number 1=541-499KHDKR-ND, Tolerance=1%, Supplier 1=DigiKey, Wattage=1/8W
R9: "RMCF0603FT10K0", Resistance=10k, Size Package=0603, Supplier Part Number 1=RMCF0603FT10K0DKR-ND, Tolerance=1%, Supplier 1=DigiKey, Wattage=1/10W
R21 R22: "MCT06030C2709FP500", Resistance=27, Size Package=0603, Supplier Part Number 1=749-1631-1-ND, Tolerance=1%, Supplier 1=DigiKey, Wattage=1/10W
R23: "RR0816Q-330-D", Resistance=33, Size Package=0603, Supplier Part Number 1=RR08Q33DDKR-ND, Tolerance=0.5%, Supplier 1=DigiKey, Wattage=1/16W
R25 R26 R27 R28: "RK73B1JTTD221J", Resistance=220, Size Package=0603, Supplier Part Number 1=2019-RK73B1JTTD221JDKR-ND, Tolerance=5%, Supplier 1=DigiKey, Wattage=1/8W
RT1 RT2: "B57164K0103J000", Supplier Part Number 1=495-2080-ND, Mounting Style=Thru-Hole, Res at 25degC=10k, Supplier 1=DigiKey, Technology=NTC
S1 S2 S3: "PTS815SJM250SMTRLFS", Supplier Part Number 1=CKN12215-6-ND, Supplier 1=DigiKey
U1: library part CMP-04899-000001-1, "IC TRNSLTR BIDIRECTIONAL 20TSSOP", Ambient Temperature Range High=+125°C, Ambient Temperature Range Low=-40°C, Manufacturer="Texas Instruments", Max Junction Temp=+150°C, Max Supply Voltage=5.5V, Min Supply Voltage=1.4V, Nominal Supply Current=8uA, Package=PW0020A, Temperature="-40°C to +125°C", Automotive=Yes, Automotive Grade="Grade 1", Category=IC, ComponentLink2Description=Datasheet, ComponentLink2URL=http://www.ti.com/lit/ds/symlink/txs0108e-q1.pdf, Data Rate=110Mbits/s, Device Class L1="Integrated Circuits (ICs)", Device Class L2="Logic ICs", Device Class L3="Voltage Level Shifters", Digikey Description="IC TRNSLTR BIDIRECTIONAL 20TSSOP", Height=1.2mm, Ipc Land Pattern Name=SOP65P640X120-20, Lead Free=Yes, Logic Function Desc=Non-inverting, Manufacturer Part Number=TXS0108EQPWRQ1, Mouser Description="Translation - Voltage Levels 8B Bidir Vltg-Level Translator ALT 595-TXS0108EPWR", Number Of Circuits=1, Number Of Inputs=8, Number Of Outputs=8, Octopart=https://octopart.com/txs0108eqpwrq1-texas+instruments-59160487, RoHS=TRUE, Standoff Height=0.05mm, Temperature Range High=+125°C, Temperature Range Low=-40°C, V A Max=3.6V, V A Min=1.4V, V B Max=5.5V, V B Min=1.65V
U2: "No Description Available", Manufacturer_Name="Analog Devices Inc", Copyright="Copyright (C) 2026 Ultra Librarian. All rights reserved.", Manufacturer_Part_Number=MAX7219CNG, RefDes=RefDes, Type=Type
U5: "Description", Manufacturer_Name=Sparkfun, Copyright="Copyright (C) 2026 Ultra Librarian. All rights reserved.", Manufacturer_Part_Number=COM-11405, RefDes=RefDes, Type=Type
U6: library part CMP-04911-000006-1, "IC BATT MGMT LI-ION AFE 30TSSOP", Manufacturer="Texas Instruments", Max Supply Voltage=25V, Min Supply Voltage=6V, Nominal Supply Current=40-130uA, Package=DBT0030A, Temperature="-40°C to +85°C", Temperature Range High=+85°C, Temperature Range Low=-40°C, Automotive=No, Category=IC, ComponentLink2Description=Datasheet, ComponentLink2URL=http://www.ti.com/lit/ds/symlink/bq76930.pdf, Device Class L1="Integrated Circuits (ICs)", Device Class L2="Power Management ICs", Device Class L3="Battery Management", Digikey Description="IC BATT MGMT LI-ION AFE 30TSSOP", Height=1.2mm, Ipc Land Pattern Name=SOP50P635X120-30, Lead Free=Yes, Manufacturer Part Number=BQ7693003DBTR, Mouser Description="6 to 10-Series Cell Li-Ion and Li-Phosphate Battery Monitor (bq76940 Family) 30-TSSOP -40 to 85", Number Of Cells=10, Number Of Outputs=2, Octopart=https://octopart.com/bq7693003dbtr-texas+instruments-34472212, RoHS=TRUE, Standoff Height=0.05mm
U7: "Description", Manufacturer_Name="Alpha and Omega Semiconductor", Copyright="Copyright (C) 2025 Ultra Librarian. All rights reserved.", Manufacturer_Part_Number=AOB290L, RefDes=RefDes, Type=Type
U9: library part CMP-0188-00714-2, "Low Power 12-Bit A/D Converter With I2C Interface, 5-Pin SOT-23, Extended Temperature, Tape and Reel", Code_IPC=SOT23-5, ComponentLink1Description="Manufacturer URL", ComponentLink1URL=http://www.microchip.com/, ComponentLink2Description=Datasheet, ComponentLink2URL=http://ww1.microchip.com/downloads/en/DeviceDoc/21732c.pdf, ComponentLink3Description="Package Specification", ComponentLink3URL=http://www.microchip.com/stellent/groups/techpub_sg/documents/packagingspec/en012702.pdf, DatasheetVersion="revC, Jul-2006", PackageDescription="5-Lead Plastic Small Outline Transistor (OT) [SOT-23]", PackageReference=SOT-23-OT5, PackageVersion="revBB, Aug-2009", RevisionNote="URLs added."
U10: library part CMP-0314-00417-3, "IC TRNSLTR BIDIRECTIONAL US8", Case/Package=VSSOP, High Level Output Current=-50mA, Low Level Output Current=50mA, Max Operating Temperature=85°C, Max Supply Voltage=5.5V, Min Operating Temperature=-40°C, Min Supply Voltage=1.65V, Package Quantity=1, Contact Plating=Gold, Data Rate=24Mbps, Height=0.8mm, Lead Free="Lead Free", Length=2.1mm, Logic Function=Translator, Number of Bits=2, Number of Channels=2, Number Of Outputs=2, Number of Pins=8, Output Type=Voltage, Packaging="Tape and Reel", Propagation Delay=4.4ns, Radiation Hardening=No, REACH SVHC="No SVHC", Turn-On Delay Time=260ns, Weight=0.00067oz, Width=2.4mm
U11: library part "[MCU] RP2350A", "QFN-60 Package", Supplier Part Number 1=2648-SC1509-A4CT-ND, Supplier 1=DigiKey
X1: library part "[Screw Terminal] 2pin", "TB002-500-02BE", Supplier Part Number 1=102-6145-ND, Supplier 1=DigiKey
X2: "MUSB-05-S-B-SM-A-K-TR", Supplier Part Number 1=SAM14226CT-ND, Supplier 1=DigiKey
X4: "0353620350", Supplier Part Number 1=WM18921-ND, Supplier 1=DigiKey
Y1: library part "[Crystal] SMD 12MHz", "815-ABM8-272-T3", Supplier Part Number 1=535-ABM8-272-T3CT-ND, Supplier 1=DigiKey

## Via types
v1: diameter 0.7, hole 0.3, Top Layer to Bottom Layer, 75 vias

## Nets (pads, with @x,y where several pads share a name; then routed paths per layer and width w, separated by ;. In a path a pad name is that pad's centre, name@x,y a point inside that pad or via, vN(x,y) a via of type N, cw(c..) or ccw(c..) an arc to the next point about the centre after c; other vN are vias at no path point)
+1V1: C35.2 C36.2 C37.2 C40.1 L1.1 U11.6 U11.23 U11.39 U11.50 | length 50.7
  Top Layer w0.2: v1(56.1,34.8) 54.7,34.8 50.6,30.7 v1(50.6,27.7) 53.2,25.1 54.9,25.1 v1(57.5,22.5) 58.4,23.4 v1(63.2,23.4) 62.75,23.85 62.75,29.15 v1(62.7,29.2)
  Bottom Layer w0.2: v1(50.6,27.7) 50.699,27.7 51.099,28.1 U11.39 ; C37.2 C40.1 55.275,37.425 55.4,37.3 55.7,37.3 56.1,36.9 v1(56.1,34.8) 56.1,32.9 56.36,32.64 U11.50 ; U11.23 57.55,24.25 57.55,22.55 v1(57.5,22.5) 58.1,21.9 C36.2 ; U11.6 62.001,28.5 v1(62.7,29.2) ; v1(63.2,23.4) 64.725,23.4 C35.2
+3V3: C2.1 C26.2 C27.2 C28.2 C29.2 C30.2 C31.2 C32.2 C33.2 C34.1 C38.2 C41.2 C42.2 M1.8 R23.1 U1.2 U1.10 U10.3 U10.6 U11.1 U11.11 U11.20 U11.30 U11.38 U11.44 U11.45 U11.49 U11.53 U11.54 | length 67.4
  Bottom Layer w0.2: U1.10 37.775,24.85 38.125,24.5 42.625,24.5 42.975,24.85 U1.2 42.975,26.15 44.525,27.7 v1(49.1,27.7) 49.756,27.044 51.744,27.044 52.4,27.7 U11.38 ; C2.1 46.625,30.025 C31.2 C29.2 C28.2 C32.2 51.725,30 v1(52.9,30) 53.4,30.5 U11.45 U11.44 ; v1(47.4,37.9) 48.975,37.9 C34.1 C26.2 C41.2 R23.1 ; U11.30 54.76,23.46 v1(53.8,22.5) 53.8,21.5 54.125,21.175 C33.2 ; v1(55.2,33.6) 55.2,32.838 55.96,32.078 U11.49 ; U11.53 U11.54 57.96,32.96 v1(58.8,33.8) ; U11.20 58.77,24.25 58.77,23.783 60.595,21.958 60.595,19.405 v1(61.4,18.6) ; U11.11 61.701,26.5 62.101,26.1 64.725,26.1 C27.2 C30.2 ; U11.1 61.01,30.51 62.51,30.51 v1(62.6,30.6) ; v1(63,13.8) 63.098,13.898 63.785,13.898 64.45,14.562 U10.6 64.45,18.248 64.4,18.298 C38.2 ; v1@63.4,39.7 63.4,38.455 M1.8 ; v1(63.4,40) 63.498,39.902 63.498,39.702 v1@63.5,39.7
  other v1: 62.2,26.1
+5V: C1.1 C39.1 R1.1 U1.19 U2.19 U9.1 U10.7 X1.1 X2.1 X4.1 | length 158.9
  Top Layer w0.2: X1.1 11.2,32.6 v1(43.2,32.6) 48.65,27.15 50.328,27.15 52.376,25.102 52.376,23.147 57.622,17.9 68.6,17.9 v1(69.2,18.5) ; X2.1@11.33,47 11.5,47.17 v1(11.5,48.1) 11.631,48.1 12.011,47.72 42.734,47.72 46.56,51.545 47.345,51.545 U2.19 48.704,52.904 48.704,53.204 v1(48.8,53.3)
  Bottom Layer w0.2: X1.1 12.05,38.05 12.05,47.55 v1(11.5,48.1) ; v1(43.2,32.6) 43.2,32.465 42.975,32.24 U1.19 42.975,30.45 43.4,30.025 C1.1 ; U2.19 47.5,49.725 47.875,49.35 R1.1 ; U10.7 64.95,18.75 65.2,19 65.275,19 C39.1 65.525,19.225 66.25,18.5 v1(69.2,18.5) 71.2,18.5 X4.1 ; U9.1 v1@69.2,18.402
ALERT_PIN: R6.1 U6.30 | length 1.5
  Bottom Layer w0.2: U6.30 36.1,20.275 R6.1
BAT: C5.2 D1.1 R3.1 U6.15 | length 38.8
  Top Layer w0.2: v1(19.1,18.8) 19.1,18.2 19.9,17.4 35.3,17.4 v1(41.9,10.8)
  Bottom Layer w0.2: v1(19.1,18.8) R3.1 19.8,20.025 22.225,22.45 C5.2 ; D1.1 42.675,7.175 42.675,9.383 42.6,9.458 42.6,10.1 v1(41.9,10.8) U6.15
Batt_Mon_Alert: C9.2 R6.2 U11.33 | length 19.2
  Bottom Layer w0.2: R6.2 C9.2 38.8,20.525 40.255,21.98 50.88,21.98 53.505,24.605 53.505,25.579 53.616,25.69 54.11,25.69 U11.33
Cell1: R15.1 X3.6 | length 2.2
  Bottom Layer w0.2: X3.6 32.2,9.66 R15.1
Cell2: R14.1 X3.5 | length 2.1
  Bottom Layer w0.2: X3.5 28.9,9.252 29.4,9.752 R14.1
Cell3: R13.1 X3.4 | length 2.1
  Bottom Layer w0.2: X3.4 26.36,9.252 26.8,9.692 R13.1
Cell4: R12.1 X3.3 | length 2.1
  Bottom Layer w0.2: X3.3 23.95,9.03 23.95,10.6 24.175,10.825 R12.1
Cell5: R11.1 R17.1 R18.1 X3.2 | length 7.5
  Bottom Layer w0.2: R18.1 R11.1@21.28,10.825 ; X3.2 R11.1@21.28,10.73 ; R11.1 21.375,10.85 21.15,11.075 21.15,11.492 20.85,11.792 20.85,13.1 21.475,13.725 R17.1
Cell6: R10.1 X3.1 | length 2.9
  Bottom Layer w0.2: R10.1 16.625,10.825 18.55,8.9 X3.1
Cell7: R8.1
Cell8: R7.1
Cell9: R5.1
Cell10: R3.2 R4.1 U7.2 | length 6.3
  Bottom Layer w0.2: U7.2 17.66,21.515 R4.1 R3.2
D_ISET: R1.2 U2.18 | length 2.8
  Bottom Layer w0.2: R1.2 49.525,49.35 50.04,49.865 U2.18
"D_LOAD (C\S\\) 3V3": U1.1 U11.37 | length 11.2
  Bottom Layer w0.2: U1.1 44.849,26.724 51.876,26.724 52.452,27.3 U11.37
"D_LOAD (C\S\\) 5V": U1.20 U2.12 | length 26.7
  Bottom Layer w0.2: U1.20 44.1,31.575 44.1,35.378 49.719,40.997 59.657,40.997 U2.12
DIG_0: U2.2 U5.12 | length 36.7
  Bottom Layer w0.2: U2.2 40.74,47.48 40.74,57.54 42,58.8 U5.12
DIG_1: U2.11 U5.9 | length 43.5
  Top Layer w0.2: U5.9 50.979,78.8 51.814,79.635 55.046,79.635 58.52,76.16 58.52,45.76 U2.11
DIG_2: U2.6 U5.8 | length 36.7
  Top Layer w0.2: U2.6 47.5,47.943 50.9,51.344 50.9,56.721 52.16,57.981 U5.8
DIG_3: U2.7 U5.6 | length 14.7
  Top Layer w0.2: U2.7 50.04,47.94 54.7,52.6 U5.6
Earth: L2.2 Mount1.1 Mount2.1 Mount3.1 Mount4.1 X2.MH | length 298
  Top Layer w0.2: Mount1.1 Mount3.1 7.8,1.2 89.2,1.2 Mount4.1 92.5,5.839 94.15,7.489 94.15,74.669 92.5,76.319 Mount2.1 ; X2.MH@8.75,43.2 8.83,43.2 X2.MH@11.08,40.95 ; X2.MH@11.33,40.95 X2.MH@11.08,40.95 ; X2.MH@11.33,49.85 5.88,49.85 5.88,40.95 X2.MH@11.08,40.95
  Bottom Layer w0.2: Mount1.1 4.5,72.625 3.6,71.725 L2.2 3.6,52.75 8.75,47.6 X2.MH@8.75,43.2
GND: B1.2 C1.2 C2.2 C7.1 C9.1 C12.1 C19.1 C20.2 C21.1 C22.1 C24.1 C25.1 C26.1 C27.1 C28.1 C29.1 C30.1 C31.1 C32.1 C33.1 C34.2 C35.1 C36.1 C37.1 C38.1 C39.2 C40.2 C41.1 C42.1 D3.2 D4.2 D5.2 D6.2 L2.1 M1.4 R16.1 R20.1 RT2.1 S3.2 U1.11 U2.4 U2.9 U6.3 U6.28 U6.29 U9.2 U10.2 U11.47 U11.61 X1.2 X2.5 X3.7 X4.2 Y1.2 Y1.4 | length 107.5
  Top Layer w0.2: X2.5 11.5,43.73 v1(11.5,42.7) ; v1(88.2,25.6) 88.2,27.2 S3.2@92.7,27.2
  Bottom Layer w0.2: L2.1 v1(6.7,71.4) ; X1.2 12.42,26.3 C21.1 ; C22.1 26.25,22.5 v1(29,22.5) ; C19.1 R16.1 31.525,15.075 C20.2 32.8,16.753 34.147,18.1 U6.28 U6.29 35.2,18.6 34.9,18.9 v1(34.9,20) ; v1(36.8,31.1) U1.11 ; C9.1 40.25,20.6 v1(41.2,20.6) ; v1@41.269,20.531 41.269,19.623 40.95,19.304 40.95,18.26 41.061,18.148 41.852,18.148 U6.3 ; v1(45.3,32.6) C1.2 46.575,31.375 C2.2 46.625,31.375 C31.1 C29.1 C28.1 C32.1 ; C7.1 C12.1 v1(46.8,16.8) ; v1(47.4,36.5) 48.975,36.5 C34.2 C26.1 C41.1 ; C41.1@51.525,36.525 52.117,37.117 53.042,37.117 53.4,37.475 53.4,37.483 53.517,37.6 53.525,37.6 53.675,37.75 53.7,37.75 53.925,37.975 C40.2 C37.1 ; v1(53.7,32.5) 54.565,32.5 55.16,31.905 U11.47 55.16,30.1 U11.61 ; v1(54.2,19.8) 55.375,19.8 C42.1 C33.1 ; Y1.2 57.7,14.176 v1(57.7,12.6) ; C36.1 C33.1 ; C24.1 58.925,16.876 Y1.4@59.825,15.975 ; Y1.4 Y1.4@59.825,15.975 ; C38.1@64.375,20.6 C38.1 C39.2 65.5,22.8 66.175,23.475 C35.1 ; U10.2 64.95,15.496 65.121,15.667 65.121,15.677 65.249,15.804 65.843,15.804 65.942,15.705 69.095,15.705 U9.2 69.425,15.375 72.325,15.375 X4.2 ; C27.1 C30.1 C35.1 ; v1(67.3,23.5) C35.1 ; v1(70,33.3) 70.55,33.85 M1.4 ; v1(83.2,32.5) 84.675,32.5 R20.1 ; C33.1 56.7,17.85 C25.1 56.65,15.518 56.918,15.25 59.1,15.25 Y1.4@59.825,15.975
GP0: U11.2
GP1: U11.3
GP2: U11.4
GP3: U11.5
GP4: R25.1 U11.7 | length 25.2
  Top Layer w0.2: v1(70.2,30.3) 70.2,30.399 71.7,31.899 71.7,41.7 v1(70.6,42.8)
  Bottom Layer w0.2: U11.7 68,28.1 v1(70.2,30.3) ; v1(70.6,42.8) R25.1
GP5: R26.1 U11.8 | length 27.4
  Top Layer w0.2: v1(70.2,29.1) 76,34.9 v1(76,42.7)
  Bottom Layer w0.2: U11.8 68.8,27.7 v1(70.2,29.1) ; v1(76,42.7) R26.1
GP6: R27.1 U11.9 | length 30.3
  Top Layer w0.2: v1(70.2,27.9) 81.2,38.9 v1(81.2,42.7)
  Bottom Layer w0.2: U11.9 69.6,27.3 v1(70.2,27.9) ; v1(81.2,42.7) R27.1
GP7: R28.1 U11.10 | length 33.8
  Top Layer w0.2: v1(70.2,26.6) 86.202,42.602 86.502,42.602 v1(86.6,42.7)
  Bottom Layer w0.2: U11.10 69.762,26.9 70.062,26.6 v1(70.2,26.6) ; v1(86.6,42.7) R28.1
GP8: U11.12
GP9: U11.13
GP10: U11.14
GP11: U11.15
GP12: U10.4 U11.16 | length 10.7
  Bottom Layer w0.2: U11.16 60.36,23.955 62.4,21.915 62.4,18.414 63.95,16.864 U10.4
GP13: U10.5 U11.17 | length 8.7
  Top Layer w0.2: v1(61.4,20.1) 62.3,19.2 v1(63.3,19.2)
  Bottom Layer w0.2: U11.17 59.96,23.412 61.4,21.972 v1(61.4,20.1) ; v1(63.3,19.2) 63.398,19.102 63.398,18.79 63.95,18.238 U10.5
GP14: U11.18
GP15: U11.19
GP16: B1.1 U11.27 | length 35.4
  Top Layer w0.2: v1(55,22.5) 56.7,20.8 v1(80.4,20.8)
  Bottom Layer w0.2: v1(55,22.5) 55.96,23.46 U11.27 ; v1(80.4,20.8) 80.45,20.75 87.45,20.75 B1.1
GP17: U11.28
GP18: U11.29
GP19: U11.31
GP20: U11.32
GP22: U6.4 U11.34 | length 16.8
  Top Layer w0.2: v1(44.8,20.7) 44.938,20.7 45.138,20.5 46.5,20.5 49.9,23.9 v1(51.4,23.9)
  Bottom Layer w0.2: U6.4@41.905,17.595 42.97,17.595 43.348,17.974 43.348,19.248 v1(44.8,20.7) ; v1(51.4,23.9) 51.498,23.998 51.498,24.298 53.298,26.098 54.118,26.098 U11.34
GP23: U6.5 U11.35 | length 18
  Top Layer w0.2: v1(44.8,19.4) 44.25,19.95 44.25,20.928 48.622,25.3 v1(51.4,25.3)
  Bottom Layer w0.2: U6.5 42.927,17.1 44.704,18.877 44.704,19.304 v1(44.8,19.4) ; v1(51.4,25.3) 52.6,26.5 U11.35
GP24: U11.36
GP28: U11.42
GP29: U11.43
"MOSI1 3V3": U1.4 U11.41 | length 14.2
  Bottom Layer w0.2: U1.4 41.675,26.15 44.425,28.9 U11.41
"MOSI1 5V": U1.17 U2.1 | length 15.8
  Bottom Layer w0.2: U2.1 34.8,38.625 41.675,31.75 U1.17
NetC11_2: C11.2 U6.11 U6.12 U6.14 | length 6.1
  Bottom Layer w0.2: U6.14 41.85,12.65 41.196,12.65 40.95,12.896 40.95,13.75 41.3,14.1 U6.11 U6.12 43.75,13.6 44.225,14.075 C11.2
NetC12_2: C12.2 U6.7 | length 2.6
  Bottom Layer w0.2: U6.7 41.93,16.13 42.93,16.13 43.6,16.8 C12.2
NetC25_2: C25.2 R19.1 Y1.3 | length 4.5
  Bottom Layer w0.2: Y1.3 58,16.325 C25.2 58.225,18.025 58.225,18.775 59.275,19.825 R19.1
NetD3_1: D3.1 R25.2 | length 2.1
  Bottom Layer w0.2: R25.2 D3.1
NetD4_1: D4.1 R26.2 | length 2.1
  Bottom Layer w0.2: D4.1 76,45.775 R26.2@76.1,45.675
NetD5_1: D5.1 R27.2 | length 2.1
  Bottom Layer w0.2: R27.2 D5.1
NetD6_1: D6.1 R28.2 | length 2.3
  Bottom Layer w0.2: R28.2@86.5,45.475 86.6,45.575 D6.1
NetR9_2: R9.2 S1.1 | length 8
  Top Layer w0.2: v1(55.2,4.9) 56.9,4.9 S1.1@57,4.8 ; S1.1@57,4.85 S1.1@61.5,4.85
  Bottom Layer w0.2: v1(55.2,4.9) 55.2,6.425 R9.2
NetR20_2: R20.2 S2.1 | length 8
  Top Layer w0.2: v1(86.4,33.9) 88.15,33.9 88.2,33.85 S2.1@92.7,33.85
  Bottom Layer w0.2: R20.2 84.725,33.9 v1(86.4,33.9)
NetU6_17: U6.17 U6.18 U6.19 | length 1
  Bottom Layer w0.2: U6.17 U6.18 U6.19
NetU6_23: U6.23 U6.24 U6.25 | length 1
  Bottom Layer w0.2: U6.23 U6.24 U6.25
QSPI_SCLK: M1.6 U11.56 | length 7.2
  Bottom Layer w0.2: U11.56@58.753,31.147 58.753,32.095 62.481,35.823 63.408,35.823 M1.6
QSPI_SD0: M1.5 U11.57 | length 6.2
  Bottom Layer w0.2: U11.57 59.17,31.15 59.17,31.97 61.795,34.595 M1.5
QSPI_SD1: M1.2 U11.59 | length 17.4
  Bottom Layer w0.2: U11.59 59.96,31.76 60.475,32.275 70.502,32.275 71.55,33.323 71.55,36.61 71.025,37.135 M1.2
QSPI_SD2: M1.3 U11.58 | length 13.4
  Bottom Layer w0.2: U11.58 59.57,31.15 59.57,31.87 61.331,33.631 67.841,33.631 70.075,35.865 M1.3
QSPI_SD3: M1.7 U11.55 | length 8.4
  Bottom Layer w0.2: U11.55 58.36,32.16 61,34.8 61,35.16 62.975,37.135 M1.7
QSPI_SS: M1.1 R24.1 U11.60 | length 35.1
  Bottom Layer w0.2: U11.60 60.36,31.418 60.37,31.428 70.107,31.428 71.87,33.19 71.87,37.53 71.25,38.15 71.25,38.18 71.025,38.405 M1.1 74.545,38.405 83.425,29.525 R24.1
REGOUT: C7.2 U6.8 | length 2.4
  Bottom Layer w0.2: U6.8 44.125,15.6 C7.2
REGSRC: C21.2 U6.9 U7.3 | length 43.7
  Bottom Layer w0.2: C21.2 15.175,26.325 16.94,28.09 16.94,28.143 20.2,31.403 U7.3 ; U7.3@20.2,36.27 24.316,32.153 25.629,32.153 37.05,20.733 37.05,19.296 41.196,15.15 41.85,15.15 U6.9
RP2350_D_N: R22.1 X2.2 | length 51.9
  Top Layer w0.2: X2.2 12.78,46.2 19.48,39.5 v1(58.1,39.5)
  Bottom Layer w0.2: v1(58.1,39.5) 58.2,39.4 R22.1
RP2350_D_P: R21.1 X2.3 | length 52.4
  Top Layer w0.2: X2.3 12.78,45.4 19.58,38.6 v1(59.5,38.6)
  Bottom Layer w0.2: R21.1 v1(59.5,38.6)
RP2350_DX_N: R22.2 U11.51 | length 5.2
  Bottom Layer w0.2: U11.51 56.76,33.86 58.2,35.3 R22.2
RP2350_DX_P: R21.2 U11.52 | length 5.6
  Bottom Layer w0.2: U11.52 57.16,33.385 R21.2
RUN: S2.2 U11.26 | length 42.5
  Top Layer w0.2: v1(56.3,22.5) 56.956,21.844 66.817,21.844 76.673,31.7 v1(86.4,31.7) 88.2,31.7 S2.2@92.7,31.7
  Bottom Layer w0.2: v1(56.3,22.5) 56.35,22.55 56.35,24.25 U11.26
"SCK1 3V3": U1.3 U11.40 | length 13.4
  Bottom Layer w0.2: U1.3 42.325,26.15 44.675,28.5 U11.40
"SCK1 5V": U1.18 U2.13 | length 33.4
  Bottom Layer w0.2: U1.18 42.325,34.925 48.782,41.382 56.179,41.382 62.74,47.943 U2.13
SCL_B_5V: U9.5 U10.8 | length 2.1
  Bottom Layer w0.2: U10.8 65.45,17.324 66.081,16.693 66.657,16.693 U9.5
SDA_B_5V: U9.4 U10.1 | length 1.7
  Bottom Layer w0.2: U10.1 65.45,14.668 65.468,14.65 U9.4
SEG_A: U2.14 U5.11 | length 36.7
  Bottom Layer w0.2: U5.11 44.54,63.239 53.979,53.8 54.343,53.8 57.304,50.84 59.34,50.84 U2.14
SEG_B: U2.16 U5.7 | length 28
  Top Layer w0.2: U5.7 56,77.5 56,52.883 55.12,52.003 U2.16
SEG_C: U2.20 U5.4 | length 7
  Top Layer w0.2: U2.20 44.96,51.92 49.62,56.58 U5.4
SEG_D: U2.23 U5.2 | length 9.3
  Top Layer w0.2: U2.23 38.397,51.7 43.497,56.8 U5.2
SEG_DP: U2.22 U5.3 | length 9.3
  Top Layer w0.2: U2.22 40.937,51.7 46.037,56.8 U5.3
SEG_E: U2.21 U5.1 | length 5.3
  Bottom Layer w0.2: U5.1 42,52.423 42.42,52.003 U2.21
SEG_F: U2.15 U5.10 | length 31.5
  Bottom Layer w0.2: U5.10 47.08,63.239 57.66,52.659 U2.15
SEG_G: U2.17 U5.5 | length 5.3
  Top Layer w0.2: U5.5 52.16,52.423 52.58,52.003 U2.17
SWCLK: U11.24
SWDIO: U11.25
TS1: R9.1 RT2.2 U6.6 | length 21.7
  Top Layer w0.2: v1(44.8,18.1) 44.898,18.002 44.898,17.702 52.4,10.2 v1(52.4,8) RT2.2
  Bottom Layer w0.2: U6.6 41.95,16.65 42.93,16.65 44.282,18.002 44.702,18.002 v1(44.8,18.1) ; RT2.2 52.6,5.15 53.925,6.475 R9.1
TS2: RT1.1 U6.13 | length 13.4
  Bottom Layer w0.2: U6.13 42.5,13.1 42.65,12.95 42.704,12.95 45.266,10.388 45.266,5.384 RT1.1
U\S\B\_\B\O\O\T\: R24.2 S3.1 | length 8
  Top Layer w0.2: v1(86.4,29.5) 88.05,29.5 88.2,29.35 S3.1@92.7,29.35
  Bottom Layer w0.2: R24.2 v1(86.4,29.5)
V_Hall: U9.3 X4.3 | length 13.7
  Bottom Layer w0.2: U9.3 69.425,14.65 77.775,6.3 X4.3
VC0: C20.1 R16.2 U6.27 | length 7.7
  Bottom Layer w0.2: R16.2 31.525,13.725 C20.1 ; C20.1@32.825,13.725 33.35,14.25 33.35,16.85 34.1,17.6 U6.27
VC1: C18.1 C19.2 R15.2 S1.2 U6.26 | length 46.6
  Top Layer w0.2: v1(55.2,2.7) 56.95,2.7 57,2.65 S1.2@61.5,2.65
  Bottom Layer w0.2: C18.1 28.925,15.075 29.15,14.85 29.15,14.775 29.95,13.975 29.95,13.925 30.175,13.7 30.225,13.7 31.525,12.4 31.975,12.4 R15.2 ; U6.26 35.07,17.1 34.67,16.7 v1(34.6,16.7) 33.67,15.77 33.67,13.37 32.683,12.383 32.408,12.383 R15.2 ; v1(55.2,2.7) 54.4,1.9 41.442,1.9 35.046,8.296 35.046,9.654 32.708,11.992 32.383,11.992 R15.2
VC2: C17.1 C18.2 R14.2 | length 3.7
  Bottom Layer w0.2: C17.1 27.625,15.075 28.65,14.05 28.65,13.95 28.875,13.725 C18.2 28.9,12.65 29.375,12.175 R14.2
VC3: C16.1 C17.2 R13.2 | length 3.7
  Bottom Layer w0.2: C16.1 26.425,15.075 27.35,14.15 27.35,13.95 C17.2@27.575,13.725 ; R13.2 26.8,12.95 C17.2@27.575,13.725 ; C17.2 C17.2@27.575,13.725
VC4: C15.1 C16.2 R12.2 | length 3.3
  Bottom Layer w0.2: R12.2 24.225,12.175 25,12.95 C15.1 C16.2
VC5: C15.2 D2.2 R11.2 U6.22 | length 25.6
  Top Layer w0.2: v1(24.9,16.4) 25.7,15.6 v1(34.6,15.6)
  Bottom Layer w0.2: R11.2 22.1,12.2 25,15.1 24.9,15.2 v1(24.9,16.4) ; v1(34.6,15.6) 35.1,15.1 U6.22 37.022,15.1 38.4,13.722 D2.2
VC5B: C14.1 R18.2 U6.21 | length 18.8
  Top Layer w0.2: v1(23.2,15) 34.1,15 v1(34.6,14.5)
  Bottom Layer w0.2: R18.2 19.025,12.175 19.25,12.4 19.25,12.425 19.95,13.125 19.95,13.5 20.175,13.725 20.225,13.725 20.927,14.427 22.627,14.427 v1(23.2,15) ; v1(34.6,14.5) 34.65,14.55 36.05,14.55 U6.21
VC5x: C5.1 C11.1 C14.2 C22.2 C23.1 D2.1 R17.2 RT1.2 U6.10 U7.1 | length 63.4
  Top Layer w0.2: v1(29,19.2) 41.8,19.2 v1(46.9,14.1)
  Bottom Layer w0.2: C23.1 C14.2 R17.2 21.525,15.075 22.7,16.25 C5.1 ; U7.1 22.74,24.268 23.925,23.083 23.925,19.9 23.175,19.15 C22.2 26.25,19.2 v1(29,19.2) ; D2.1 41.725,8.9 41.425,9.2 41.425,9.876 40.63,10.671 40.63,13.984 41.196,14.55 41.85,14.55 U6.10 41.95,14.65 45.025,14.65 45.325,14.35 45.35,14.35 45.575,14.125 C11.1 ; v1(46.9,14.1) C11.1 ; RT1.2 48,10.478 45.575,12.903 C11.1
VC6: C13.1 C23.2 R10.2 U6.20 | length 28.3
  Top Layer w0.2: v1(15.1,12.2) 33.909,12.2 34.309,11.8 v1(34.4,11.8)
  Bottom Layer w0.2: v1(15.1,12.2) 16.575,12.2 R10.2 C13.1 C23.2 ; v1(34.4,11.8) 34.4,13.054 35.396,14.05 36.05,14.05 U6.20
VC7: C10.1 C13.2 R8.2 | length 3.4
  Bottom Layer w0.2: C10.1 13.825,13.725 14.05,13.95 15.175,15.075 R8.2 C13.2
VC8: C8.1 C10.2 R7.2 | length 6.3
  Bottom Layer w0.2: R7.2 C8.1 13.8,19.825 C10.2
VC9: C6.1 C8.2 R5.2 | length 2.9
  Bottom Layer w0.2: C8.2 R5.2 C6.1
VC10: C6.2 D1.2 R4.2 U6.16 | length 32.2
  Top Layer w0.2: v1(17.5,18.8) 17.5,18 21.05,14.45 32.528,14.45 36,10.978 v1(36,10.9)
  Bottom Layer w0.2: C6.2 R4.2@17.775,20.025 ; v1(17.5,18.8) 17.5,19.725 17.55,19.775 17.55,19.8 R4.2@17.775,20.025 ; R4.2 R4.2@17.775,20.025 ; U6.16 36.05,12.1 36,12.05 v1(36,10.9) 36,7.8 37.5,6.3 D1.2
VREG_AVDD: R23.2 U11.46 | length 7
  Bottom Layer w0.2: R23.2 52.7,32.2 53.448,31.452 54.75,31.452 54.76,31.442 U11.46
VREG_LX: L1.2 U11.48 | length 6.1
  Bottom Layer w0.2: L1.2 54.3,36.4 54.3,33.2 54.68,32.82 54.697,32.82 55.48,32.037 55.48,32.02 55.56,31.94 U11.48
XIN: C24.2 U11.21 Y1.1 | length 11.5
  Bottom Layer w0.2: U11.21 58.362,24.258 58.362,23.738 60.275,21.825 C24.2 60.275,17.109 60.8,16.583 60.8,14.95 60.075,14.225 Y1.1
XOUT: R19.2 U11.22 | length 3.7
  Bottom Layer w0.2: U11.22 57.962,24.258 57.962,23.685 59.05,22.597 59.05,21.4 59.275,21.175 R19.2
pads on no net: U1.5 U1.6 U1.7 U1.8 U1.9 U1.12 U1.13 U1.14 U1.15 U1.16 U2.3 U2.5 U2.8 U2.10 U2.24 U6.1 U6.2 X2.4

## Polygon pours and split planes (outlines as drawn)
+3V3 on Layer (PWR) "NONET_L01_P-001" (solid, pour order 1): 4.458,-0.05 92.458,-0.05 ccw(c92.458,4.45) 96.958,4.45 96.958,77.45 ccw(c92.458,77.45) 92.458,81.95 4.458,81.95 ccw(c4.458,77.45) -0.042,77.45 -0.042,4.45 ccw(c4.458,4.45)
GND on Layer (GND) "NONET_L01_P-001" (solid, pour order 0): 96.992,77.496 96.992,4.496 cw(c92.492,4.496) 92.492,-0.004 4.492,-0.004 cw(c4.492,4.496) -0.008,4.496 -0.008,77.496 cw(c4.492,77.496) 4.492,81.996 92.492,81.996 cw(c92.492,77.496)

## Keep-outs
Keep-Out Layer:
  the board outline again, w0.2

## Silkscreen, mask and mechanical layers (free items; w line width, h text height)
Top Overlay:
  lines w0.254: 6.95,23.042 7.458,23.55 ; 7.958,23.042 7.45,23.55 7.45,16.3 14.7,16.3 14.192,15.792 ; 14.192,16.8 14.7,16.292 ; 16.4,49.65 27.4,49.65 ; 14.65,42.611 29.15,42.611 29.15,52.711 14.65,52.711 14.65,42.611
  text "Max Current" at 15.702,50.35 h1.2
  text "??A" at 16.568,44.272 h4
  text "+5V" at 2.675,36.033 h0.85 r270
  text "RUN" at 87.467,34.975 h0.85
  text "GND" at 2.775,30.933 h0.85 r270
  text "\USB_BOOT" at 86.018,23.746 h0.85
  text "Board" at 8.35,19.1 h1.2
  text "82mm" at 6.7,18.067 h1 r90
  text "Dim" at 8.35,17.3 h1.2
  text "97mm" at 9.267,14.7 h1
  text "TS1_BOOT" at 56.214,6.146 h0.85
  text "Cell6" at 14.925,6.059 h0.85 r90
  text "Cell0_GND" at 38.654,2.559 h0.85 r90
  text "Hall" at 76.455,1.975 h0.85
  text "GND" at 80.667,1.975 h0.85
  text "+5V" at 84.067,1.975 h0.85
Bottom Overlay:
  text "Battery Monitor V2" at 84.023,79.717 h0.85
  text "Ashlynn Vick" at 84.044,78.017 h0.85
  text "Fall 2026" at 84.041,76.275 h0.85

## Text inside footprints (layer, text, board x,y; h text height)
B1: Top Overlay "+" at 82.1,21.3 h1.2
U2: Mechanical 13 "*" at 35.435,43.89 h0.85 r90
U5: Mechanical 13 "*" at 42.635,54.884 h0.85 r90
U7: Mechanical 13 "*" at 23.058,29.082 h0.85